# Altium PCB Smart-Switch-v2.0.PcbDoc (part 1 of 3)
Units mil, origin at the board's own origin, x right, y up, seen from the top; angles counter-clockwise.
Board outline 1456.69 x 1377.95 mil, 4 copper layers (Top Layer, Power Layer, Ground Layer, Bottom Layer), stack 39.334 mil thick; 71 components, 41 nets, 221 pads, 302 vias.
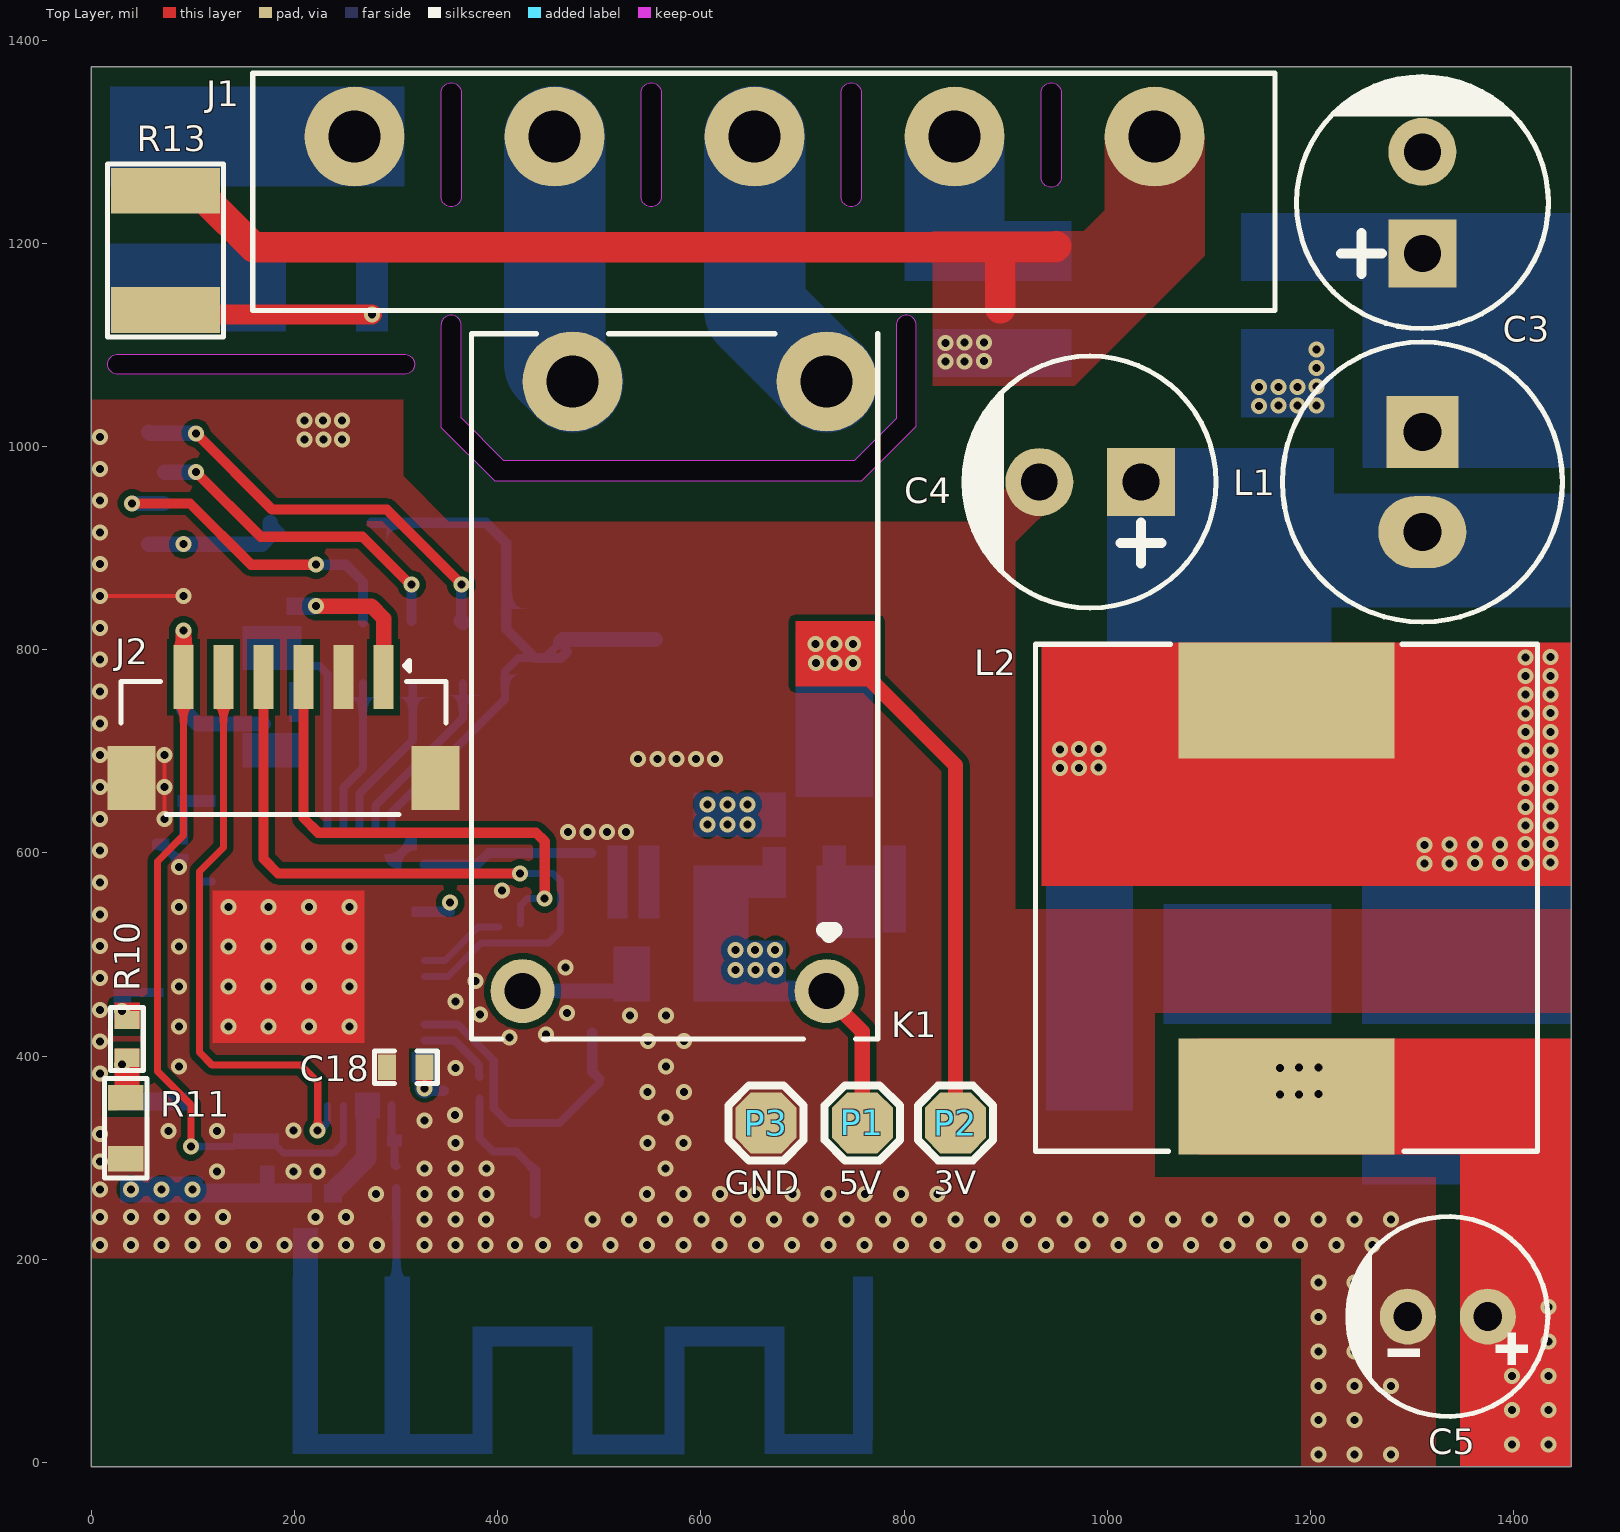
[diagram p0: Top Layer view]
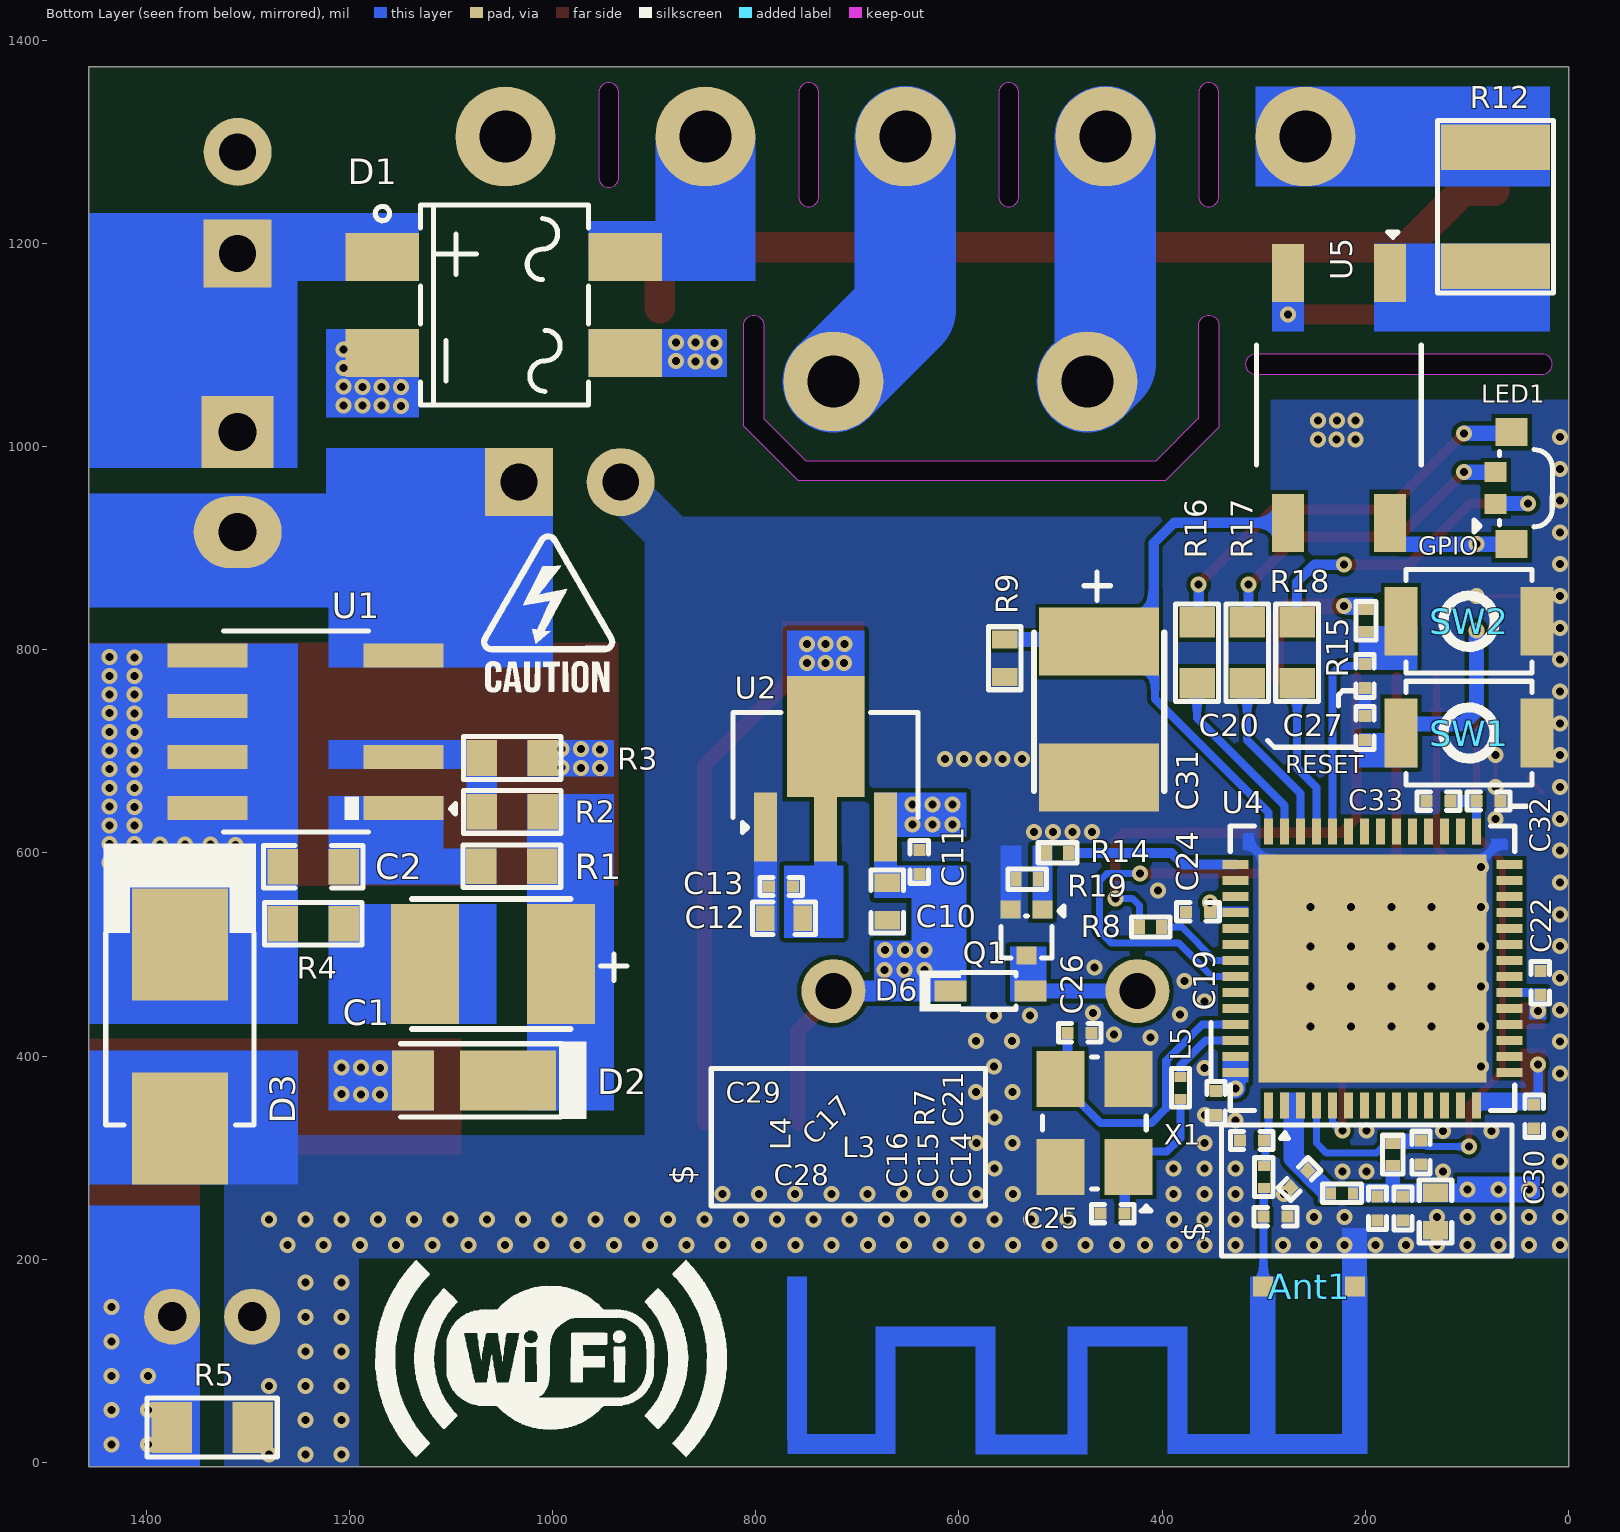
[diagram p1: Bottom Layer view, seen from below]
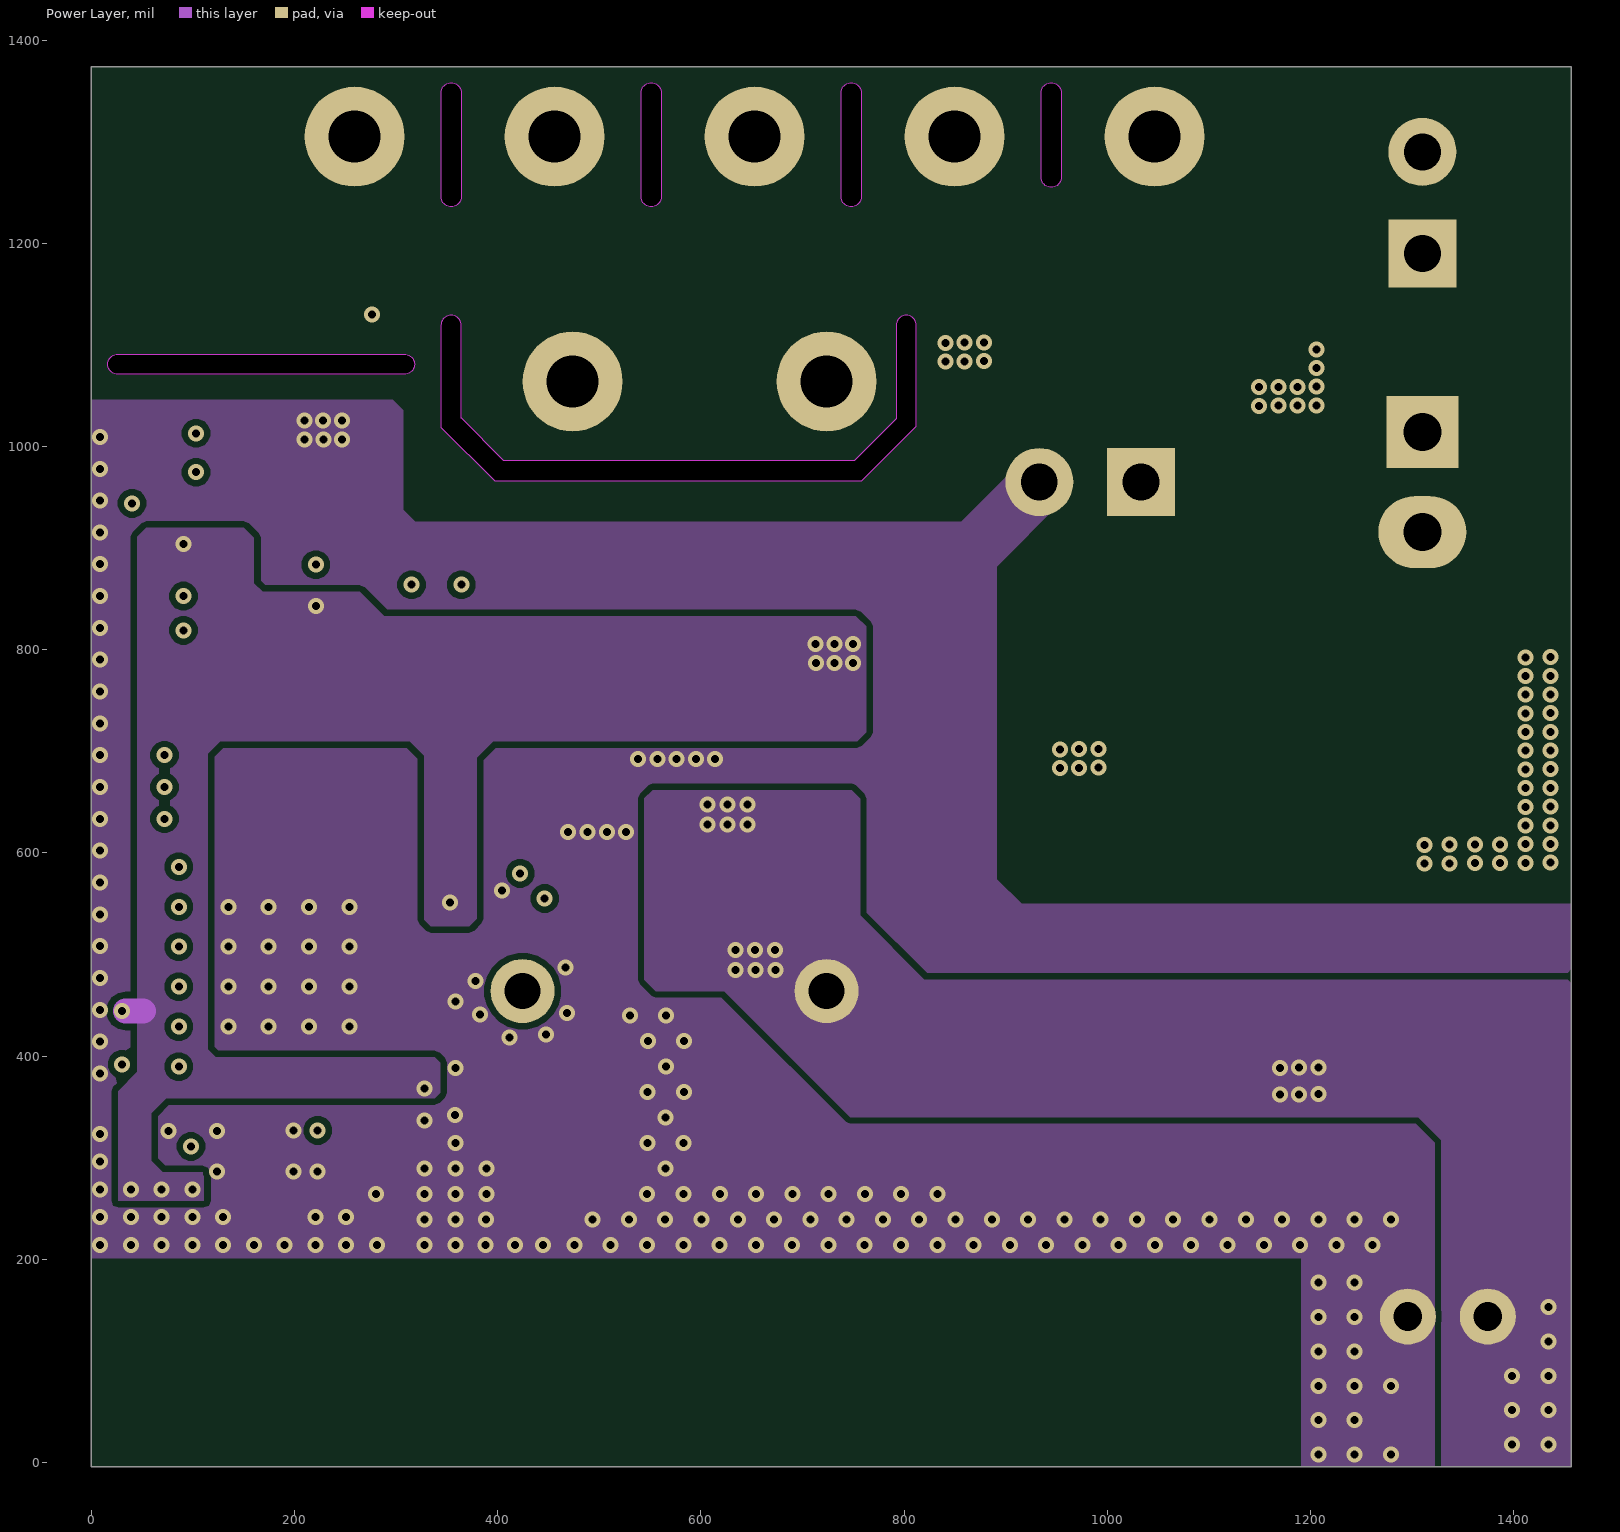
[diagram p2: Power Layer]
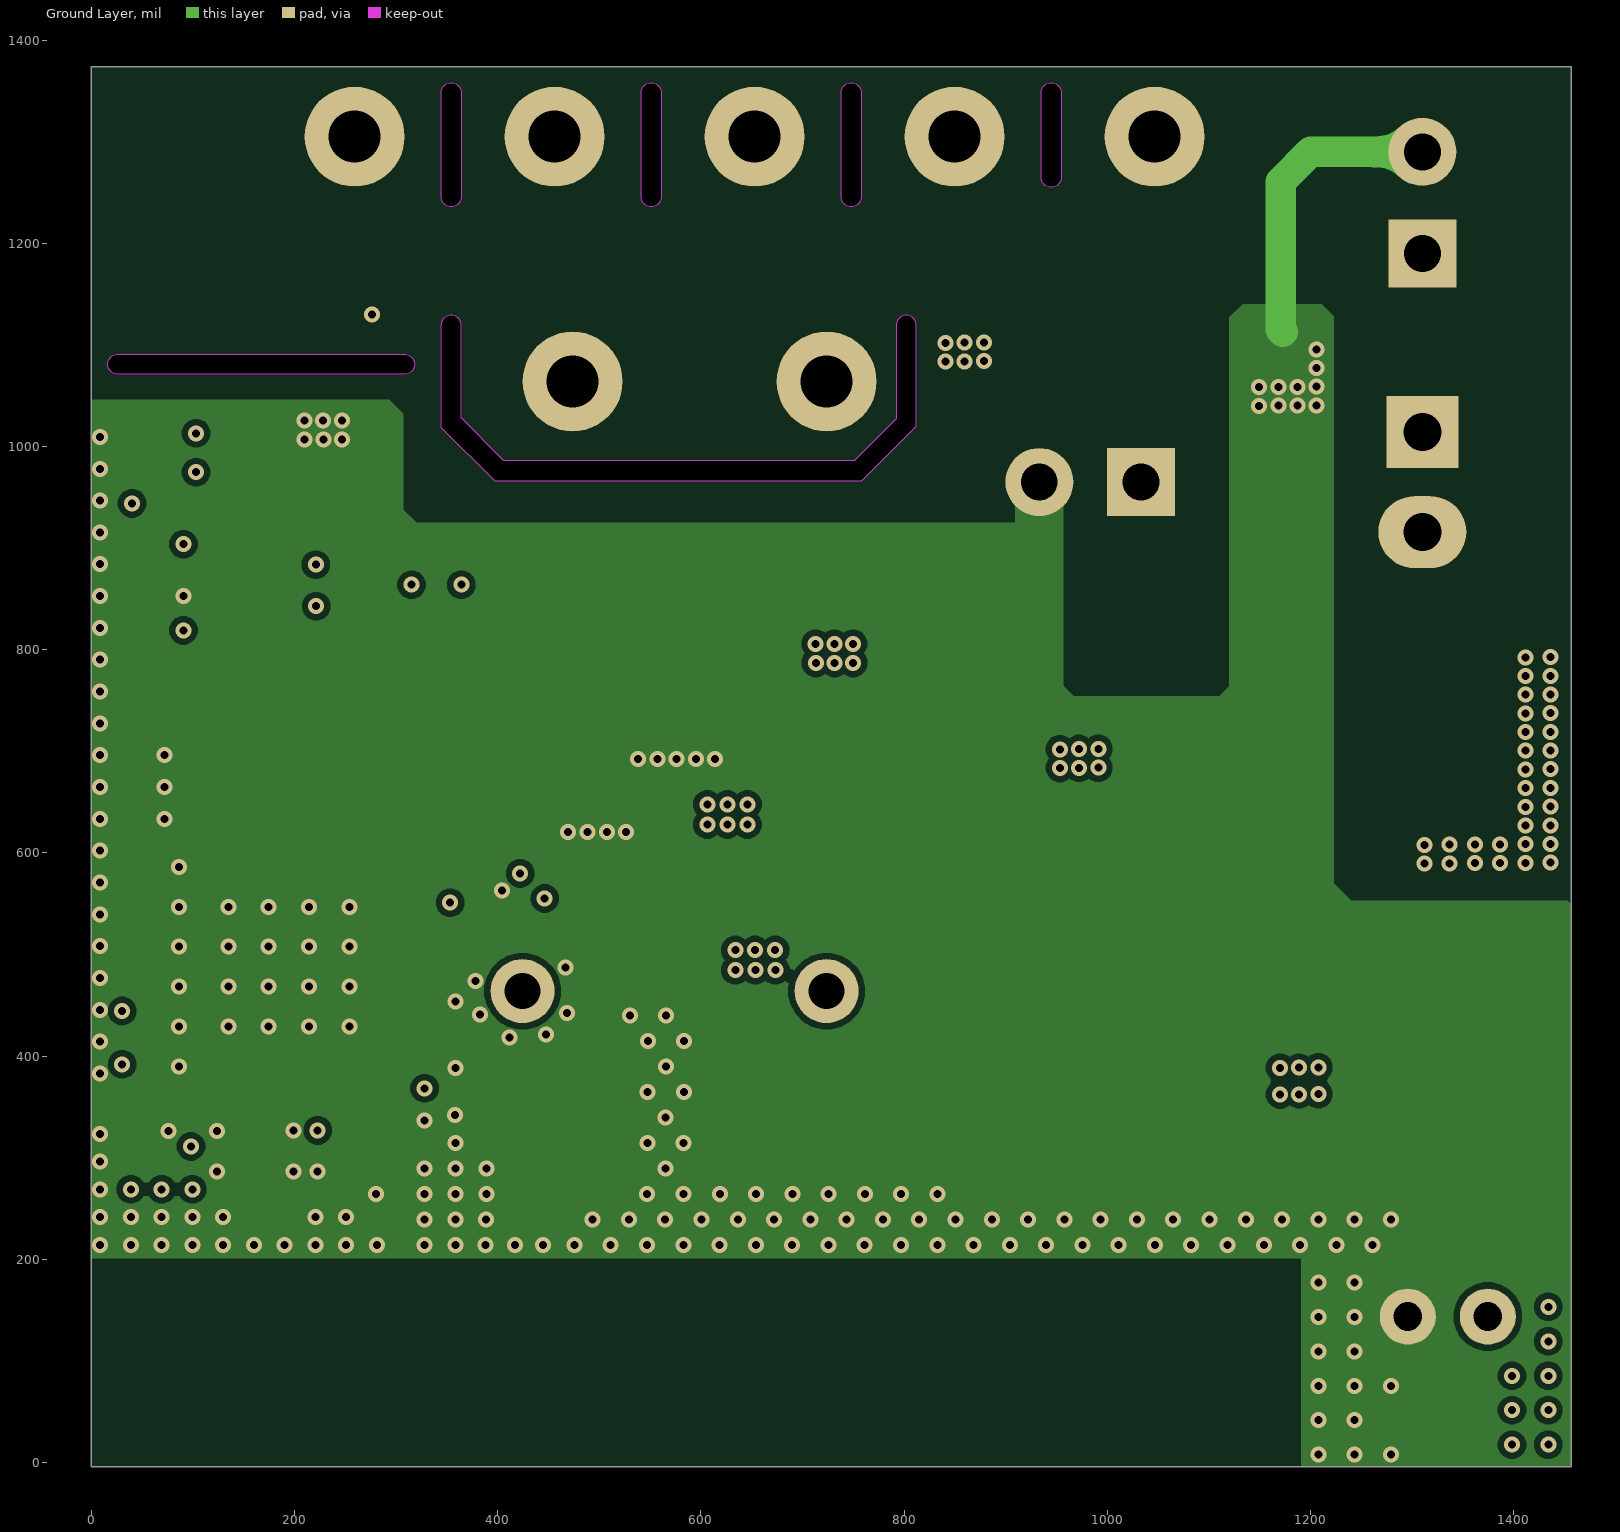
[diagram p3: Ground Layer]
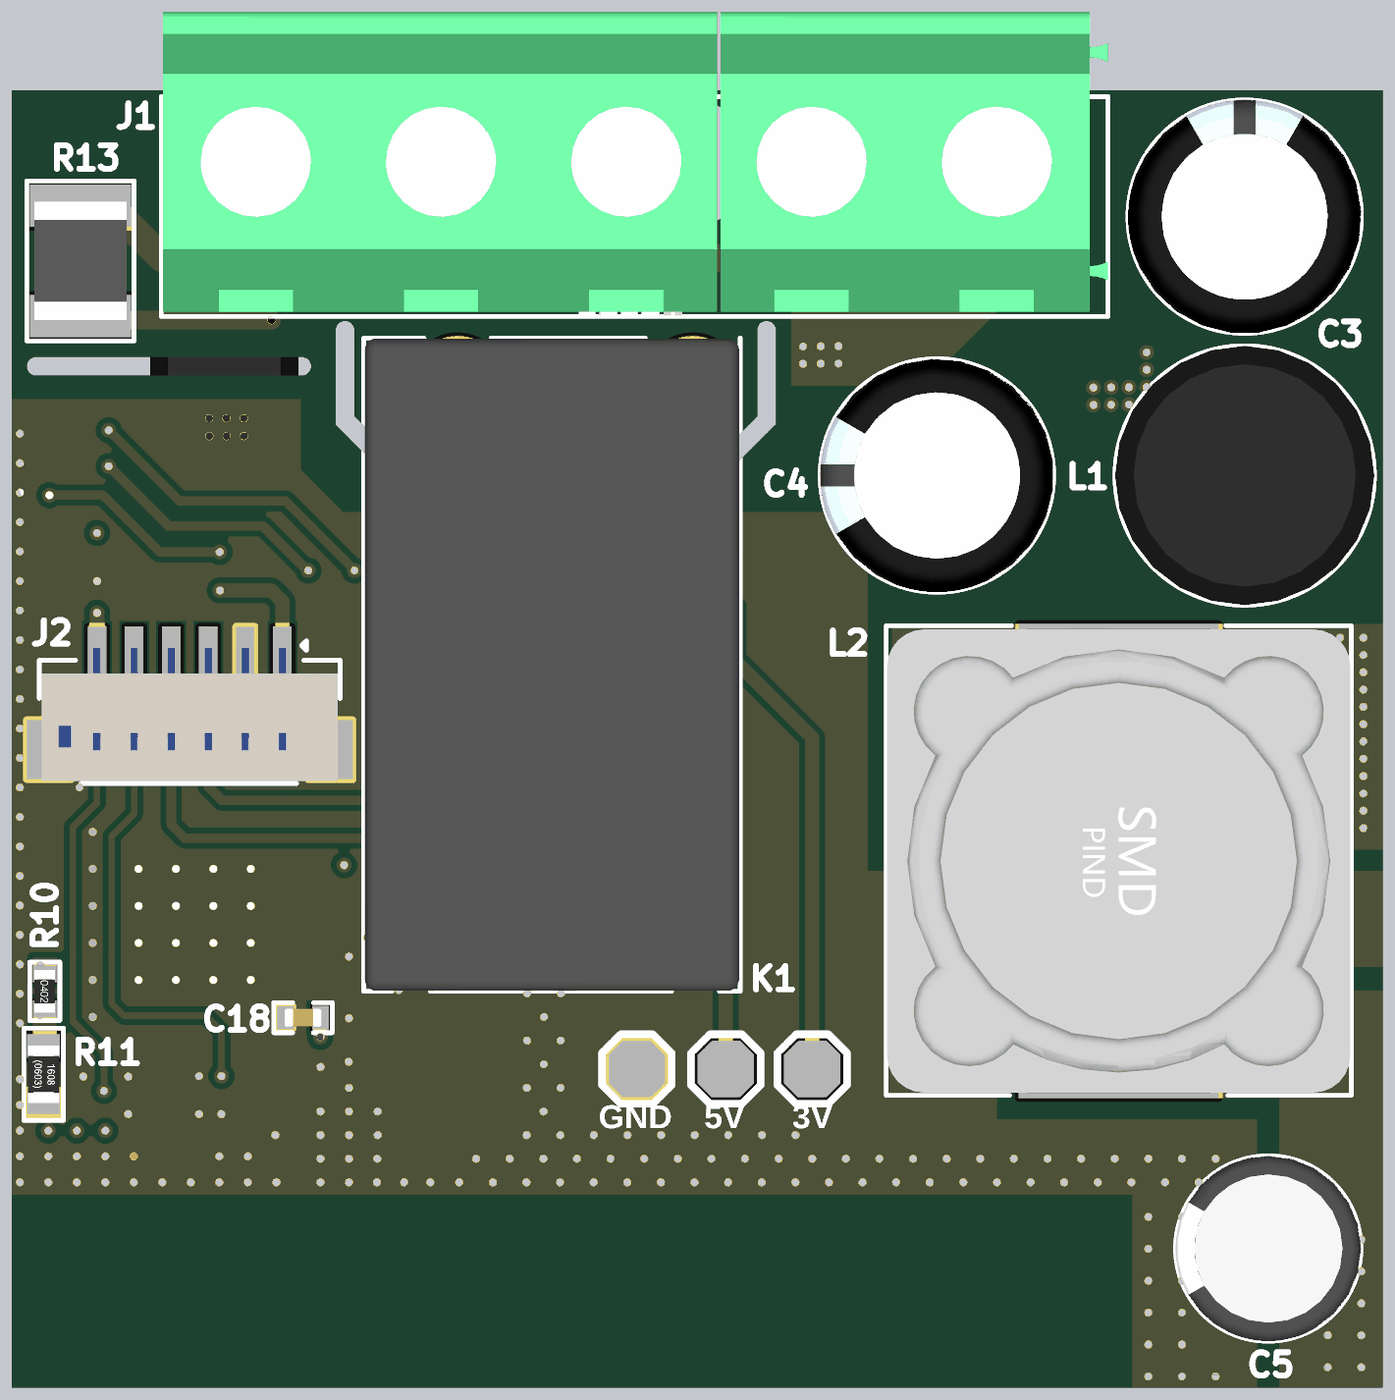
[diagram p5: 3D render of the assembled board from above, using the file's embedded part models]
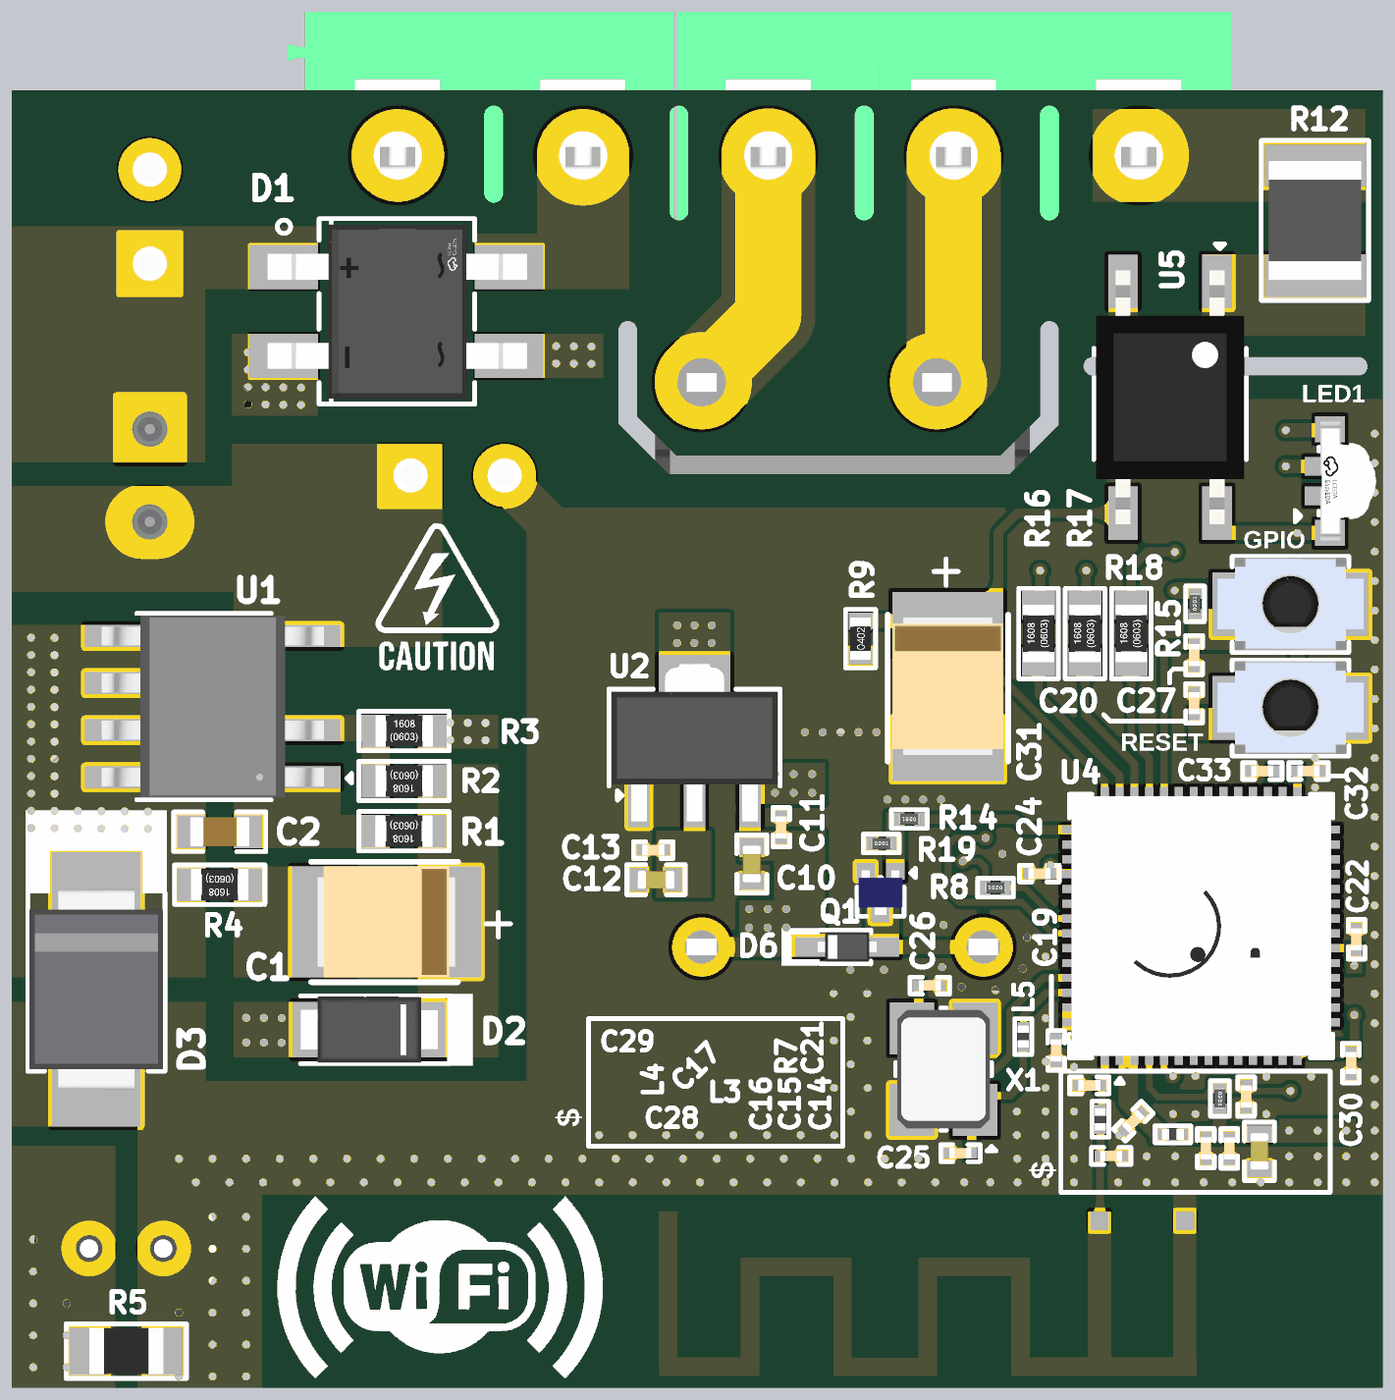
[diagram p6: 3D render of the assembled board from below, using the file's embedded part models]

## Layer stack, top to bottom
Top Solder: solder mask 0.4, Solder Resist, Dk 3.8
Top Layer: signal copper 1.378
Dielectric 2: prepreg 5.1, PP-006, Dk 4.6
Power Layer: signal copper 1.378
Dielectric 1: dielectric 23.622, FR-4, Dk 4.8
Ground Layer: signal copper 1.378
Dielectric 3: prepreg 5.1, PP-006, Dk 4.6
Bottom Layer: signal copper 1.378
Bottom Solder: solder mask 0.4, Solder Resist, Dk 3.8

## Board outline
0,-3.98 0,1373.98 1456.69,1373.98 1456.69,-3.98
cut-out: 344.09,1018.83 396.79,966.13 758.37,966.13 812.04,1019.8 812.04,1119.22 ccw(c802.04,1119.22) 802.04,1129.22 ccw(c802.04,1119.22) 792.04,1119.22 792.04,1027.33 750.84,986.13 406,986.13 364.5,1027.63 364.09,1027.63 364.09,1119.22 ccw(c354.09,1119.22) 354.09,1129.22 ccw(c354.09,1119.22) 344.09,1119.22
cut-out: 934.7,1264.98 934.7,1348 cw(c944.7,1348) 944.7,1358 cw(c944.7,1348) 954.7,1348 954.7,1264.98 cw(c944.7,1264.98) 944.7,1254.98 cw(c944.7,1264.98)
cut-out: 26,1071 cw(c26,1081) 16,1081 cw(c26,1081) 26,1091 308.02,1091 cw(c308.02,1081) 318.02,1081 cw(c308.02,1081) 308.02,1071
cut-out: 354.15,1235.98 cw(c354.15,1245.98) 344.15,1245.98 344.15,1348 cw(c354.15,1348) 354.15,1358 cw(c354.15,1348) 364.15,1348 364.15,1245.98 cw(c354.15,1245.98)
cut-out: 551,1235.98 cw(c551,1245.98) 541,1245.98 541,1348 cw(c551,1348) 551,1358 cw(c551,1348) 561,1348 561,1245.98 cw(c551,1245.98)
cut-out: 747.85,1235.98 cw(c747.85,1245.98) 737.85,1245.98 737.85,1348 cw(c747.85,1348) 747.85,1358 cw(c747.85,1348) 757.85,1348 757.85,1245.98 cw(c747.85,1245.98)

## Design rules (kind name [scope] priority, off if disabled: settings)
Clearance "Top Layer" [OnLayer('Top Layer')] p1: gap=4 ignorepadtopadclearanceinfootprint=FALSE except(6: Arc-Poly Track-Poly SMDPad-Poly THPad-Poly Via-Poly Fill-Poly Poly-Poly)
Clearance "Inner 1" [OnLayer('Power Layer')] p2: gap=4 ignorepadtopadclearanceinfootprint=FALSE except(6: Arc-Poly Track-Poly SMDPad-Poly THPad-Poly Via-Poly Fill-Poly Poly-Poly)
Clearance "Inner 2" [OnLayer('Ground Layer')] p3: gap=4 ignorepadtopadclearanceinfootprint=FALSE except(6: Arc-Poly Track-Poly SMDPad-Poly THPad-Poly Via-Poly Fill-Poly Poly-Poly)
Clearance "Bottom Layer" [OnLayer('Bottom Layer')] p4: gap=4 ignorepadtopadclearanceinfootprint=FALSE except(6: Poly-Poly)
ComponentClearance [All] p1: gap=0 collisioncheckmode=3 verticalgap=0 showdistances=FALSE
MinimumSolderMaskSliver [All] p1: minsoldermaskwidth=0
PolygonConnect [All] p1: connectstyle=Direct reliefconductorwidth=10 reliefentries=4 polygonreliefangle="45 Angle" airgapwidth=10
RoutingVias [All] p1: holewidth=7.87 width=15.75 viastyle="Through Hole" minholewidth=7.87 minwidth=15.75 maxholewidth=7.87 maxwidth=15.75
SilkToSilkClearance [All] p1: silktosilkclearance=0
SilkToSolderMaskClearance [IsPad] p1: minsilkscreentomaskgap=0 clearancetoexposedcopper=TRUE
SolderMaskExpansion [All] p1: expansion=4 istentingtop=FALSE
Width RF [InNetClass('RF')] p1: maxlimit=8.19 minlimit=5.18 preferedwidth=8.19 toplayer_minwidth=8.19 midlayer1_maxwidth=5.18 midlayer1_prefwidth=5.18 midlayer2_maxwidth=5.18 midlayer2_prefwidth=5.18 bottomlayer_minwidth=8.19 impedanceprofiledriven=TRUE impedanceprofileid={6EA76BCA-AD47-4699-BACC-62EAA46FC2F5} impedanceprofilevalue=50.000000 minimp=50.000000 maximp=50.000000 favimp=50.000000 // RF Impedance
Width [All] p2: maxlimit=100 minlimit=5 preferedwidth=10 minimp=50.000000 maximp=50.000000 favimp=50.000000
26 further rules are at their usual default settings.

## Classes and differential pairs
net class RF: NetAnt1_ANT# NetC29_2
component class U_Power-Sheet: 3 C1 C2 C3 C4 C5 C10 C11 C12 C13 D1 D2 D3 J1 L1 L2 P1 P2 P3 R1 R2 R3 R4 R5 SS U1 U2
component class U_Controller-Sheet: 2 Ant1 C14 C15 C16 C17 C18 C19 C20 C21 C22 C24 C25 C26 C27 C28 C29 C30 C31 C32 C33 D6 J2 K1 L3 L4 L5 LED1 Q1 R7 R8 R9 R10 R11 R12 R13 R14 R15 R16 R17 R18 R19 SW1 SW2 U4 U5 X1

## Components (designator, comment, footprint, x,y, rotation, side; value= is the part's Value field where it differs from the comment)
Ant1 "ESP Patch Anttena" "ESP Patch Antenna" 198,221 r0 bottom locked net-tie
C1 "10uF" Case-B 1058.7,490.7 r0 bottom
C2 "0.1uF" Cap-0603 1235.69,586.46 r180 bottom
C3 "2.2uF" ECG2GM2R2E09OTBO 1310,1240 r90 top
C4 "2.2uF" ECG2GM2R2E09OTBO 983,965 r180 top
C5 "220uF" 10ZLQ220MEFC5X11 1335.03,143.68 r180 top
C10 "10uF" Cap-0402 670.43,552.19 r90 bottom
C11 "0.1uf" CAP-0201 639.06,591.19 r270 bottom value=100nF
C12 "10uF" Cap-0402 772.15,535.55 r180 bottom
C13 "0.1uf" CAP-0201 775.06,567 r180 bottom value=100nF
C14 "10uF" Cap-0402 131,247 r90 bottom
C15 "1uF" CAP-0201 163.05,250.02 r90 bottom
C16 "0.1uf" CAP-0201 188.05,250.21 r90 bottom value=100nF
C17 "0.1uf" CAP-0201 265,279 r135 bottom value=100nF
C18 "1uF" Cap-0402 309.45,389 r0 top
C19 "0.1uF" CAP-0201 347.04,354.09 r90 bottom value=100nF
C20 "0.1uf" CAP-0201 200.45,723 r270 bottom value=100nF
C21 "1uF" CAP-0201 145.21,305.09 r90 bottom
C22 "0.1uf" CAP-0201 27.84,472.21 r270 bottom value=100nF
C24 "0.1uf" CAP-0201 364.82,542.03 r180 bottom value=100nF
C25 "22PF" CAP-0201 448.72,245 r180 bottom value=22pF
C26 "22PF" CAP-0201 481.23,423 r0 bottom value=22pF
C27 "0.1uf" CAP-0201 200.45,774.14 r90 bottom value=100nF
C28 "2.7pF" CAP-0201 288.5,242 r0 bottom
C29 "4.7pF" CAP-0201 311.81,317 r180 bottom
C30 "0.1uF" CAP-0201 33.84,340.72 r90 bottom value=100nF
C31 "33uF" Case-B 462,740.94 r270 bottom
C32 "0.1uF" CAP-0201 78.8,651.04 r0 bottom value=100nF
C33 "1uF" CAP-0201 128,651 r180 bottom
D1 "MB10S" MBS10S 1048,1139.32 r180 bottom
D2 "DFLF1800-7" PowerDI123 1090.88,376.17 r180 bottom
D3 "STTH3R06U" SMB_ 1366.82,419.13 r90 bottom
D6 "1N4148WT" SOD-523F 569,464.15 r0 bottom
J1 "WJ127-5.0-5P" WJ127-5.0-5P 652.78,1305.03 r180 top
J2 "Voltlink Target" "Voltlink Target" 189.06,723.31 r180 top
K1 "HF32FA-G/005-HSL1" HF32FA-G/005-HSL1 574,764 r90 top locked
L1 "1mH" SPK0608-102MB 1310,965 r270 top
L2 "470uH" SMDRI127-471MT 1176.18,555.37 r270 top locked
L3 "2nH" IND-0201 223,265 r0 bottom
L4 "1.6nH" IND-0201 300,281 r90 bottom
L5 "24nH" IND-0201 382,368.83 r270 bottom
LED1 "MHS110FRGBCT" MHS110FRGBCT 64,959 r270 bottom
P1 "TEST POINT" Test-point 758.74,334.32 r270 top
P2 "TEST POINT" Test-point 850.51,334.32 r270 top
P3 "TEST POINT" Test-point 664.08,334.32 r270 top
Q1 "MMBT3904M" SOT-723 533.63,521.77 r0 bottom
R1 "3K" Res-0603#1 1040,587 r180 bottom
R2 "3.83K" Res-0603#1 1039.83,640.4 r180 bottom value=3.83kR
R3 "2.49K" Res-0603#1 1039.84,693.42 r0 bottom value=2.49kR
R4 "15R" Res-0603#1 1235.71,530.29 r180 bottom
R5 "10K" RES-0805 1335,34.6 r0 bottom
R7 "10K" Res-0201 173,303.09 r270 bottom
R8 "499R" Res-0201 411.41,527.11 r0 bottom
R9 "1K" Res-0402 554.89,791.64 r90 bottom
R10 "10K" Res-0402 35,417 r270 top
R11 "10k" Res-0603#2 33.84,328.91 r90 top value=10kR
R12 "33K" Res_1210 72,1236 r270 bottom
R13 "33K" Res_1210 73,1193 r270 top
R14 "4.7K" Res-0201 503,600 r0 bottom
R15 "10K" Res-0201 199.45,828.63 r90 bottom
R16 "240R" Res-0603#1 365.7,797.02 r270 bottom
R17 "100R" RES-0603 316.35,797.02 r270 bottom
R18 "100R" RES-0603 267.25,797.02 r270 bottom
R19 "47K" Res-0201 532.78,574 r180 bottom value=47kR
SW1 "B3U-1000P" B3U-1000P 98,718 r0 bottom
SW2 "B3U-1000P" B3U-1000P 98,828 r0 bottom
U1 "LNK3207D-TL" SO-8C 1243.22,719.42 r0 bottom
U2 "LD1117AG-33-AB3-A-R" SOT-89-3 731.25,670.02 r180 bottom
U4 "ESP32-S3FH4R2" "QFNWB-56 (7×7)" 193,486.36 r90 bottom
U5 "PS2705-1-F3-A" SOP-4_2.54 226,1048 r270 bottom
X1 "40MHz" X322540MPB4SI_ 466.72,334.25 r90 bottom value=40MHZ

## Footprints (in the part's own frame and the unit in brackets; to place one, negate y for a bottom-side part, rotate by r counter-clockwise, add the part's x,y. Pads: shape width x height; smd on the part's side, far side on the other; paste and mask are expansions set on the pad)
10ZLQ220MEFC5X11 [mm]
  round 1.4 hole 0.72 paste+0 mask+0.05: 1(-1,0) 2(1,0)
  silkscreen extent -2.5,-2.5 2.54,2.5, body extent -2.5,-2.5 2.5,2.5, height 11.01
B3U-1000P [mm] "SWITCH TACTILE SPST-NO 0.05A 12V"
  rect 0.82x1.72 smd: 1(-1.7,0) 2(1.7,0)
  silkscreen extent -1.57,-1.3 1.57,1.3, body extent -2,-1.26 2,1.24, height 1.6
CAP-0201 [mm]
  rect 0.3x0.3 smd mask+0.055: 1(-0.3,0) 2(0.3,0)
  silkscreen extent -0.53,-0.23 0.53,0.23, body extent -0.3,-0.15 0.3,0.15, height 0.28
Cap-0402 [mil]
  rect 18x25 smd mask+2.36: 1(-18.5,0) 2(18.5,0)
  silkscreen extent -31,-16 31,16, body extent -20,-10 20,10, height 19
Cap-0603 [mil]
  rect 30x35 smd mask+2.36: 1(-30,0) 2(30,0)
  silkscreen extent -49,-21 49,21, body extent -32,-16 31,16, height 34
Case-B [mm]
  rect 1.7x3 smd paste+0: 1(-1.7,0) 2(1.7,0)
  silkscreen extent -3.35,-1.63 2.03,1.63, body extent -1.85,-1.5 1.85,1.5, height 2.16
ECG2GM2R2E09OTBO [mm]
  rect 1.7x1.7 hole 0.92 paste+0 mask+0.051: 1(-1.27,0)
  round 1.7 hole 0.92 paste+0 mask+0.051: 2(1.27,0)
  silkscreen extent -3.15,-3.15 3.17,3.15, body extent -3.16,-3.15 3.16,3.15, height 11.11
"ESP Patch Antenna" [mm]
  rect 0.5x0.5 smd: ANT#(2.616,1.213) GND(0.305,1.213)
  Top Layer region: 14.498,5.405 14.498,4.905 11.798,4.905 11.798,5.405
  Top Layer region: 12.3,2.21 11.8,2.21 11.8,5.055 12.3,5.055
  Top Layer region: 9.648,2.209 9.648,2.709 11.959,2.709 11.959,2.209
  Top Layer region: 9.3,5.029 9.8,5.029 9.8,2.21 9.3,2.21
  Top Layer region: 9.796,5.409 9.796,4.909 6.996,4.909 6.996,5.409
  Top Layer region: 7.5,2.21 7,2.21 7,5.029 7.5,5.029
  Top Layer region: 4.873,2.209 4.873,2.709 7.133,2.709 7.133,2.209
  Top Layer region: 4.5,5.029 5,5.029 5,2.21 4.5,2.21
  Top Layer region: 2.3,5.029 2.93,5.029 2.93,0.963 2.3,0.963
  Top Layer region: -0.002,4.905 -0.002,5.405 4.998,5.405 4.998,4.905
  Top Layer region: 0,5.029 0.63,5.029 0.63,0.963 0,0.963
  Top Layer region: 14.005,5.055 14.505,5.055 14.505,0.963 14.005,0.963
HF32FA-G/005-HSL1 [mm]
  round 1.6 hole 0.9: 1(-7.62,-3.8) 2(-7.62,3.8)
  round 2.5 hole 1.3: 3(7.62,2.55) 4(7.62,-3.8)
  silkscreen extent -8.81,-5.08 8.81,5.08, body extent -8.8,-5.05 8.8,5.06, height 12.6
IND-0201 [mm]
  rect 0.25x0.3 smd mask+0.055: 1(-0.275,0) 2(0.275,0)
  silkscreen extent -0.48,-0.23 0.48,0.23, body extent -0.3,-0.15 0.3,0.15, height 0.15
MBS10S [mm]
  rect 1.84x1.2 smd paste+0 mask+0.051: 1(-3.037,1.2) 2(-3.036,-1.2) 3(3.037,-1.2) 4(3.036,1.2)
  silkscreen extent -3.21,-2.5 2.11,2.5, body extent -3.47,-2.35 3.53,2.35, height 2.62
MHS110FRGBCT [mm]
  rect 0.7x0.8 smd: 1(1.4,0.2) 4(-1.4,0.2)
  rect 0.5x0.55 smd: 2(0.4,-0.2) 3(-0.4,-0.2)
  silkscreen extent -0.91,-0.1 0.91,-0.1, body extent -1.6,-0.05 1.6,1.45, height 1.01
PowerDI123 [mm]
  rect 1.05x1.5 smd: 1(-1.187,0)
  rect 2.4x1.5 smd: 2(1.188,0)
  silkscreen extent -1.5,-0.97 3.15,0.96, body extent -1.49,-0.89 2.21,0.89, height 1
"QFNWB-56 (7×7)" [mm]
  rect 0.65x0.22 smd: 1(-3.425,2.6) 2(-3.425,2.2) 3(-3.425,1.8) 4(-3.425,1.4) 5(-3.425,1) 6(-3.425,0.6) 7(-3.425,0.2) 8(-3.425,-0.2) 9(-3.425,-0.6) 10(-3.425,-1) 11(-3.425,-1.4) 12(-3.425,-1.8) 13(-3.425,-2.2) 14(-3.425,-2.6) 29(3.425,-2.6) 30(3.425,-2.2) 31(3.425,-1.8) 32(3.425,-1.4) 33(3.425,-1) 34(3.425,-0.6) 35(3.425,-0.2) 36(3.425,0.2) 37(3.425,0.6) 38(3.425,1) 39(3.425,1.4) 40(3.425,1.8) 41(3.425,2.2) 42(3.425,2.6)
  rect 0.22x0.65 smd: 15(-2.6,-3.425) 16(-2.2,-3.425) 17(-1.8,-3.425) 18(-1.4,-3.425) 19(-1,-3.425) 20(-0.6,-3.425) 21(-0.2,-3.425) 22(0.2,-3.425) 23(0.6,-3.425) 24(1,-3.425) 25(1.4,-3.425) 26(1.8,-3.425) 27(2.2,-3.425) 28(2.6,-3.425) 43(2.6,3.425) 44(2.2,3.425) 45(1.8,3.425) 46(1.4,3.425) 47(1,3.425) 48(0.6,3.425) 49(0.2,3.425) 50(-0.2,3.425) 51(-0.6,3.425) 52(-1,3.425) 53(-1.4,3.425) 54(-1.8,3.425) 55(-2.2,3.425) 56(-2.6,3.425)
  rect 5.7x5.7 smd: 57(0,0)
  silkscreen extent -3.56,-3.56 3.56,3.56, body extent -3.5,-3.51 3.5,3.49, height 0.92
Res-0201 [mm]
  rect 0.27x0.37 smd mask+0.055: 1(-0.275,0) 2(0.275,0)
  silkscreen extent -0.48,-0.25 0.48,0.25, body extent -0.3,-0.15 0.3,0.15, height 0.29
Res-0402 [mil]
  rect 18x25 smd mask+2.17: 1(-18.5,0) 2(18.5,0)
  silkscreen extent -32,-17 32,16, body extent -23,-11 23,11, height 16
Res-0603#1 [mil]
  rect 30x35 smd: 1(-30,0) 2(30,0)
  silkscreen extent -48,-21 48,21, body extent -31,-17 31,17, height 18
Res-0603#2 [mil]
  rect 25x35 smd: 1(-30,0) 2(30,0)
  silkscreen extent -49,-21 49,21, body extent -31,-17 31,17, height 18
RES-0603 [mil]
  rect 30x35 smd: 1(-30,0) 2(30,0)
  silkscreen extent -48,-21 48,21, body extent -31,-17 31,17, height 18
RES-0805 [mil] "SMD 0805"
  rect 40x50 smd: 1(-40,0) 2(40,0)
  silkscreen extent -64,-29 64,29, body extent -39,-25 39,24, height 24
Res_1210 [mm]
  rect 1.14x2.72 smd: 1(-1.49,0) 2(1.49,0)
  silkscreen extent -2.16,-1.45 2.16,1.45, body extent -1.6,-1.25 1.6,1.25, height 0.7
SMB_ [mm]
  rect 2.8x2.4 smd: 1(-2.3,0) 2(2.3,0)
  silkscreen extent -2.21,-1.9 4.83,1.91, body extent -2.7,-1.8 2.7,1.8, height 2.3
SMDRI127-471MT [mm]
  rect 2.9x5.4 smd: 1(-4.95,0) 2(4.95,0)
  silkscreen extent -6.35,-6.27 6.32,6.27, body extent -6.28,-6.25 6.28,6.25, height 8
SO-8C [mm]
  rect 2x0.6 smd: 1(-2.45,1.905) 2(-2.45,0.635) 4(-2.45,-1.905) 5(2.45,-1.905) 6(2.45,-0.635) 7(2.45,0.635) 8(2.45,1.905)
  silkscreen extent -3.75,-2.51 2.05,2.51, body extent -3,-2.45 3,2.45, height 1.76
SOD-523F [mm]
  rect 0.8x0.52 smd: 1(-1,0) 2(1,0)
  silkscreen extent -0.64,-0.51 1.78,0.51, body extent -0.8,-0.4 0.8,0.4, height 0.7
SOP-4_2.54 [mm]
  rect 1.45x0.8 smd: 1(-3.125,1.27) 2(-3.125,-1.27) 3(3.125,-1.27) 4(3.125,1.27)
  silkscreen extent -4.14,-2.06 1.68,2.06, body extent -3.43,-2 3.43,2, height 2.02
SOT-89-3 [mm]
  rect 0.58x1.73 smd: 1(-1.5,-1.132) 2(0,-1.132) 3(1.5,-1.132)
  rect 1.933x3.03 smd: 2(0,1.132)
  silkscreen extent -2.31,-1.27 2.31,1.73, body extent -2.25,-1.84 2.25,2.41, height 1.54
SOT-723 [mm]
  rect 0.5x0.45 smd: 1(-0.4,-0.575) 2(0.4,-0.575) 3(0,0.575)
  silkscreen extent -0.94,-0.66 0.64,0.64, body extent -0.6,-0.6 0.6,0.6, height 0.5
SPK0608-102MB [mm]
  rect 1.8x1.8 hole 0.95: 1(-1.25,0)
  oval 1.8x2.2 hole 0.95: 2(1.25,0)
  silkscreen extent -3.5,-3.5 3.5,3.5, body extent -3.5,-3.49 3.5,3.49, height 11
Test-point [mil]
  oct 60x60 smd: 1(0,0)
  silkscreen extent -37,-37 37,37
"Voltlink Target" [mm]
  rect 0.5x1.6 smd: 1(-2.5,-1.262) 2(-1.5,-1.262) 3(-0.5,-1.262) 4(0.5,-1.262) 5(1.5,-1.262) 6(2.5,-1.262)
  rect 1.2x1.6 smd: MP1(-3.8,1.262) MP2(3.8,1.262)
  silkscreen extent -4.06,-1.68 4.06,2.17, body extent -4,-1.49 4,2.11, height 4.25
WJ127-5.0-5P [mm]
  round 2.5 hole 1.3: 1(-10,0) 2(-5,0) 3(0,0) 4(5,0) 5(10,0)
  silkscreen extent -13,-1.58 12.55,4.34, body extent -13,-3.88 12.5,4.32, height 10.1
X322540MPB4SI_ [mm]
  rect 1.4x1.2 smd: 1(-1.1,-0.85) 2(1.1,-0.85) 3(1.1,0.85) 4(-1.1,0.85)
  silkscreen extent -1.65,-1.3 1.65,1.3, body extent -1.6,-1.25 1.6,1.25, height 0.8

## Part data
Ant1: "ESP32 MIFA PCB ANTENNA", Item Type=Antenna, Manufacturer Part Number="ESP Patch Anttena"
C1: library part CA45-B025K106T, "10uF 25V 2.5Ω@100kHz ±10% CASE-B-3528 Tantalum Capacitors ROHS", LCSC Part Number=C119050, Manufacturer="Xiangyee in S&T", Package=Case-B, ComponentLink1Description=LCSC, ComponentLink1URL=https://www.lcsc.com/product-detail/Tantalum-Capacitors_Hunan-Xiangyee-in-S-T-CA45-B025K106T_C119050.html, Item Type=Capacitor, Manufacturer Part Number=CA45-B025K106T
C2: library part CL10B104KB8NNNC, "CAP CER 0.1UF 50V X7R 0603", Capacitance=100nF, Case Code (Imperial)=0603, Case Code (Metric)=1608, Dielectric=X7R, LCSC Part Number=C1591, Manufacturer=Samsung, Max Operating Temperature=125°C, Min Operating Temperature=-55°C, Package Quantity=1, Supplier Part Number 1=1276-1000-1-ND, Tolerance=10%, Voltage=50V, Case/Package=0603, Category="Ceramic Capacitors", ComponentLink1Description=https://datasheet.ciiva.com/25803/cl10b104kb8nnnc-25803393.pdf?src-supplier=Digi-Key, ComponentLink1URL=https://datasheet.ciiva.com/25803/cl10b104kb8nnnc-25803393.pdf?src-supplier=Digi-Key, ComponentLink2Description=https://datasheet.ciiva.com/26838/getdatasheetpartid-89097-26838411.pdf?src-supplier=Verical, ComponentLink2URL=https://datasheet.ciiva.com/26838/getdatasheetpartid-89097-26838411.pdf?src-supplier=Verical, ComponentLink3Description=https://datasheet.ciiva.com/29198/456651-da-01-en-vs-kondensator-0605-29198839.pdf?src-supplier=Conrad, ComponentLink3URL=https://datasheet.ciiva.com/29198/456651-da-01-en-vs-kondensator-0605-29198839.pdf?src-supplier=Conrad, Construction=Flat, Contact Plating=Tin, Depth=0.8mm, Height=0.8mm, Lead Free="Lead Free", Length=1.6mm, Manufacturer Part Number=CL10B104KB8NNNC, Material=Ceramic, Mount="Surface Mount", Packaging="Tape and Reel", Pricing 1="1=0.10000, 10=0.03000, 50=0.01640, 100=0.01340, 500=0.00954, 1000=0.00750 (USD)", Radiation Hardening=No, RoHS=Yes, RoHS Compliant=Yes, Series=CL, Stock 1=3998791, Supplier 1=Digi-Key, Thickness=0.035inch, Voltage Rating=50V, Voltage Rating (DC)=50V, Width=0.031inch
C3 C4: library part ECG2GM2R2E09OTBO, "2.2uF 400V ±20% 70mA@100kHz Plugin,D6.3xL9mm Aluminum Electrolytic Capacitors - Leaded ROHS", LCSC Part Number=C525475, Manufacturer=Yunxing, Package=Plugin,D6.3xL9mm, ComponentLink1Description=LCSC, ComponentLink1URL=https://www.lcsc.com/product-detail/Aluminum-Electrolytic-Capacitors-Leaded_Yunxing-ECG2GM2R2E09OTBO_C525475.html, Item Type=Capacitor, Manufacturer Part Number=ECG2GM2R2E09OTBO
C5: library part 10ZLQ220MEFC5X11, "220uF 10V ±20% Plugin,D5xL11mm Aluminum Electrolytic Capacitors - Leaded ROHS", LCSC Part Number=C694058, Manufacturer=Rubycon, Package=Plugin,D5xL11mm, ComponentLink1Description=LCSC, ComponentLink1URL=https://www.lcsc.com/product-detail/Aluminum-Electrolytic-Capacitors-Leaded_Rubycon-10ZLQ220MEFC5X11_C694058.html, Item Type=Capacitor, Manufacturer Part Number=10ZLQ220MEFC5X11
C10 C12 C14: library part CL05A106MP5NUNC, "CAP CER 10UF 10V X5R 0402", Case Code (Imperial)=0402, Case Code (Metric)=1005, Dielectric=X5R, LCSC Part Number=C315248, Manufacturer=Samsung, Max Operating Temperature=85°C, Min Operating Temperature=-55°C, Package Quantity=1, Tolerance=20%, Voltage Rating=10V, Capacitance=10uF, Case/Package=0402, Category="Ceramic Capacitors", ComponentLink1Description=https://datasheet.ciiva.com/25721/cl05a106mp5nunc-25721584.pdf?src-supplier=Digi-Key, ComponentLink1URL=https://datasheet.ciiva.com/25721/cl05a106mp5nunc-25721584.pdf?src-supplier=Digi-Key, ComponentLink2Description=https://datasheet.ciiva.com/26838/getdatasheetpartid-745310-26838170.pdf?src-supplier=Verical, ComponentLink2URL=https://datasheet.ciiva.com/26838/getdatasheetpartid-745310-26838170.pdf?src-supplier=Verical, Construction=Flat, Contact Plating=Tin, Depth=0.5mm, Item Type=Capacitor, Lead Free="Lead Free", Length=1mm, Manufacturer Part Number=CL05A106MP5NUNC, Mount="Surface Mount", Packaging="Tape and Reel", Pricing 1="10000=0.02537 (USD)", Radiation Hardening=No, RoHS=Yes, RoHS Compliant=Yes, Series=CL, Stock 1=1729850, Supplier 1=Avnet, Supplier Part Number 1=CL05A106MP5NUNC, Termination=Wraparound, Thickness=0.028inch, Width=0.02inch
C11 C13 C16 C17 C19 C20 C22 C24 C27 C30 C32: library part GRM033R61E104KE14D, "CAP CER 0.1UF 25V X5R 0201", Case Code (Imperial)=0201, Case Code (Metric)=0603, Dielectric=X5R, LCSC Part Number=C76939, Manufacturer=Murata, Max Operating Temperature=85°C, Min Operating Temperature=-55°C, Package Quantity=15000, Supplier Part Number=1852066, Tolerance=10%, Voltage Rating=25V, Case/Package=0201, Category="Ceramic Capacitors", ComponentLink1Description=http://www.farnell.com/datasheets/2867843.pdf?src-supplier=Farnell, ComponentLink1URL=http://www.farnell.com/datasheets/2867843.pdf?src-supplier=Farnell, ComponentLink2Description=http://www.mouser.com/ds/2/281/c02e-2905.pdf?src-supplier=Mouser, ComponentLink2URL=http://www.mouser.com/ds/2/281/c02e-2905.pdf?src-supplier=Mouser, ComponentLink3Description=https://datasheet.octopart.com/GRM033R61E104KE14D-Murata-datasheet-22122223.pdf?src-supplier=Future+Electronics, ComponentLink3URL=https://datasheet.octopart.com/GRM033R61E104KE14D-Murata-datasheet-22122223.pdf?src-supplier=Future+Electronics, ComponentLink4Description=http://www.farnell.com/datasheets/2867843.pdf?src-supplier=Element14, ComponentLink4URL=http://www.farnell.com/datasheets/2867843.pdf?src-supplier=Element14, ComponentLink5Description=http://search.murata.co.jp/Ceramy/image/img/A01X/G101/ENG/GRM033R61E104KE14-01.pdf?src-supplier=Digi-Key, ComponentLink5URL=http://search.murata.co.jp/Ceramy/image/img/A01X/G101/ENG/GRM033R61E104KE14-01.pdf?src-supplier=Digi-Key, ComponentLink6Description=http://www.farnell.com/datasheets/2867843.pdf?src-supplier=Newark, ComponentLink6URL=http://www.farnell.com/datasheets/2867843.pdf?src-supplier=Newark, ComponentLink7Description=https://datasheet.octopart.com/GRM033R61E104KE14D-Murata-datasheet-165579666.pdf?src-supplier=TME, ComponentLink7URL=https://datasheet.octopart.com/GRM033R61E104KE14D-Murata-datasheet-165579666.pdf?src-supplier=TME, Height=0.3mm, Item Type=Capacitor, Lead Free="Lead Free", Length=0.024inch, Manufacturer Part Number=GRM033R61E104KE14D, Material=4241ConductorMaterial, Mounting Technology="Surface Mount", Packaging="Tape and Reel", Pricing="1000=0.008, 5000=0.007, 10000=0.006 (GBP)", RoHS=Yes, RoHS Compliant=Yes, Series=GRM, Stock=14000, Supplier=Rs, Termination=SMD/SMT, Thickness=0.013inch, Voltage Rating (DC)=25V, Weight=1.2E-05oz, Width=0.012inch
C15 C21 C33: library part GRM033R61C105ME15D, "CAP CER 1UF 16V X5R 0201", LCSC Part Number=C335102, Manufacturer=Murata, Supplier Part Number 1=490-18654-1-ND, Category="Ceramic Capacitors", ComponentLink1Description=https://datasheet.octopart.com/GRM033R61C105ME15D-Murata-datasheet-155345049.pdf?src-supplier=Element14, ComponentLink1URL=https://datasheet.octopart.com/GRM033R61C105ME15D-Murata-datasheet-155345049.pdf?src-supplier=Element14, ComponentLink2Description=https://datasheet.octopart.com/GRM033R61C105ME15D-Murata-datasheet-165579666.pdf?src-supplier=TME, ComponentLink2URL=https://datasheet.octopart.com/GRM033R61C105ME15D-Murata-datasheet-165579666.pdf?src-supplier=TME, Item Type=Capacitor, Manufacturer Part Number=GRM033R61C105ME15D, Pricing 1="1=0.14, 10=0.098, 50=0.0554, 100=0.0459, 500=0.0322, 1000=0.02665, 2500=0.02481, 5000=0.0227 (USD)", RoHS=No, Stock 1=12823, Supplier 1=Digi-Key
C18: library part CC0402KRX5R7BB105, "CAP CER 1UF 16V X5R 0402", Case Code (Imperial)=0402, Case Code (Metric)=1005, Dielectric=X5R, LCSC Part Number=C325464, Manufacturer=Yageo, Max Operating Temperature=85°C, Min Operating Temperature=-55°C, Supplier Part Number 1=311-1691-6-ND, Tolerance=10%, Voltage Rating=16V, Capacitance=1uF, Case/Package=0402, ComponentLink1Description=http://www.yageo.com/documents/recent/UPY-GPHC_X5R_4V-to-50V_12.pdf?src-supplier=Avnet+Europe, ComponentLink1URL=http://www.yageo.com/documents/recent/UPY-GPHC_X5R_4V-to-50V_12.pdf?src-supplier=Avnet+Europe, Composition=Ceramic, Depth=0.5mm, Halogen Free="Halogen Free", Height=0.5mm, Item Type=Capacitor, Lead Free="Lead Free", Length=1mm, Manufacturer Part Number=CC0402KRX5R7BB105, Mount="Surface Mount", Packaging="Tape and Reel", Pricing 1="1=0.36, 10=0.252, 100=0.1512, 500=0.1134, 1000=0.09576, 2500=0.09072, 5000=0.08568 (USD)", Radiation Hardening=No, Stock 1=1405667, Supplier 1=Digi-Key, Termination=SMD/SMT, Thickness=0.022inch, Voltage Rating (DC)=16V, Weight=2.3E-05oz, Width=0.02inch
C25 C26: library part GRM0335C1H220JA01D, "CAP CER 22PF 50V C0G/NP0 0201", Case Code (Imperial)=0201, Case Code (Metric)=0603, Dielectric=C0G, LCSC Part Number=C76924, Manufacturer=Murata, Max Operating Temperature=125°C, Min Operating Temperature=-55°C, Package Quantity=1, Supplier Part Number=8202728, Temperature Coefficient=30ppm/°C, Tolerance=5%, Voltage=50V, Case/Package=0201, Category="Ceramic Capacitors", ComponentLink1Description=https://datasheet.ciiva.com/6271/partnumbering-e-01-6271146.pdf?src-supplier=Digi-Key, ComponentLink1URL=https://datasheet.ciiva.com/6271/partnumbering-e-01-6271146.pdf?src-supplier=Digi-Key, ComponentLink2Description=https://datasheet.ciiva.com/6271/partnumbering-e-01-6271143.pdf?src-supplier=Digi-Key, ComponentLink2URL=https://datasheet.ciiva.com/6271/partnumbering-e-01-6271143.pdf?src-supplier=Digi-Key, ComponentLink3Description=https://datasheet.ciiva.com/6271/partnumbering-e-01-6271149.pdf?src-supplier=Digi-Key, ComponentLink3URL=https://datasheet.ciiva.com/6271/partnumbering-e-01-6271149.pdf?src-supplier=Digi-Key, Depth=0.3mm, Height=0.3mm, Item Type=Capacitor, Lead Free="Lead Free", Length=0.024inch, Manufacturer Part Number=GRM0335C1H220JA01D, Material=4241ConductorMaterial, Mounting Technology="Surface Mount", Packaging="Tape and Reel", Pricing="500=0.004, 5000=0.003, 12500=0.002, 50000=0.002 (GBP)", RoHS=Yes, RoHS Compliant=Yes, Series=GRM, Stock=9500, Supplier=Rs, Termination=SMD/SMT, Voltage Rating=50V, Voltage Rating (DC)=50V, Width=0.012inch
C28: library part CC0201CRNPO9BN2R7, "CAP CER 2.7PF 50V C0G/NPO 0201", Case Code (Imperial)=0201, Case Code (Metric)=0603, Dielectric=C0G, LCSC Part Number=C325439, Manufacturer=Yageo, Max Operating Temperature=125°C, Min Operating Temperature=-55°C, Voltage Rating=50V, Case/Package=0201, Category="Ceramic Capacitors", ComponentLink1Description=https://datasheet.ciiva.com/13208/upy-gp-np0-16v-to-50v-8-13208314.pdf?src-supplier=Mouser, ComponentLink1URL=https://datasheet.ciiva.com/13208/upy-gp-np0-16v-to-50v-8-13208314.pdf?src-supplier=Mouser, Item Type=Capacitor, Length=0.024inch, Manufacturer Part Number=CC0201CRNPO9BN2R7, Mounting Technology="Surface Mount", Packaging="Tape and Reel", Pricing="15000=0.0017 (USD)", RoHS=Yes, RoHS Compliant=Yes, Series=CC, Stock=15000, Supplier=Avnet, Supplier Part Number=CC0201CRNPO9BN2R7, Termination=SMD/SMT, Thickness=0.013inch, Voltage Rating (DC)=50V, Weight=6E-06oz, Width=0.012inch
C29: library part CC0201BRNPO9BN4R7, "CAP CER 4.7PF 50V C0G/NPO 0201", Case/Package=0201, LCSC Part Number=C505471, Manufacturer=Yageo, Max Operating Temperature=125°C, Min Operating Temperature=-55°C, Voltage Rating=50V, Category="Ceramic Capacitors", ComponentLink1Description=https://www.yageo.com/upload/media/product/productsearch/datasheet/mlcc/UPY-GP_NP0_16V-to-50V_18.pdf?src-supplier=Digi-Key, ComponentLink1URL=https://www.yageo.com/upload/media/product/productsearch/datasheet/mlcc/UPY-GP_NP0_16V-to-50V_18.pdf?src-supplier=Digi-Key, ComponentLink2Description=http://www.yageo.com/documents/recent/UPY-GP_NP0_16V-to-50V_16.pdf?src-supplier=Digi-Key, ComponentLink2URL=http://www.yageo.com/documents/recent/UPY-GP_NP0_16V-to-50V_16.pdf?src-supplier=Digi-Key, Item Type=Capacitor, Length=0.024inch, Manufacturer Part Number=CC0201BRNPO9BN4R7, Mounting Technology="Surface Mount", Packaging="Tape and Reel", Pricing="15000=0.0023 (USD)", RoHS=Yes, RoHS Compliant=Yes, Series=CC, Stock=210000, Supplier="Arrow Electronics", Supplier Part Number=CC0201BRNPO9BN4R7, Thickness=0.013inch, Width=0.012inch
C31: library part TAJB336K010RNJ, "CAP TANT 33UF 10% 10V 1411", Case Code (Imperial)=1210, Case Code (Metric)=3528, Dielectric Material=Tantalum, ESR (Equivalent Series Resistance)=1.8R, LCSC Part Number=C7202, Leakage Current=3.3uA, Manufacturer="Kyocera AVX", Max Operating Temperature=125°C, Min Operating Temperature=-55°C, Package Quantity=1, Supplier Part Number 1=1364604P, Tolerance=10%, Voltage=10V, Case/Package=1210, Category="Tantalum Capacitors", ComponentLink1Description=https://datasheet.ciiva.com/26341/559435-da-01-en-tacc-b-3-2-mm-x-2-5-mm-x-1-9-mm-33-uf-26341776.pdf?src-supplier=Conrad, ComponentLink1URL=https://datasheet.ciiva.com/26341/559435-da-01-en-tacc-b-3-2-mm-x-2-5-mm-x-1-9-mm-33-uf-26341776.pdf?src-supplier=Conrad, ComponentLink2Description=https://datasheet.ciiva.com/7775/49917-7775706.pdf?src-supplier=Element14, ComponentLink2URL=https://datasheet.ciiva.com/7775/49917-7775706.pdf?src-supplier=Element14, ComponentLink3Description=https://datasheet.ciiva.com/7775/49917-7775705.pdf?src-supplier=Element14, ComponentLink3URL=https://datasheet.ciiva.com/7775/49917-7775705.pdf?src-supplier=Element14, ComponentLink4Description=https://datasheet.ciiva.com/7775/1680476-7775704.pdf?src-supplier=Element14, ComponentLink4URL=https://datasheet.ciiva.com/7775/1680476-7775704.pdf?src-supplier=Element14, ComponentLink5Description=https://datasheet.ciiva.com/264/taj-264134.pdf?src-supplier=Digi-Key, ComponentLink5URL=https://datasheet.ciiva.com/264/taj-264134.pdf?src-supplier=Digi-Key, ComponentLink6Description=https://datasheet.ciiva.com/264/taj-264133.pdf?src-supplier=Digi-Key, ComponentLink6URL=https://datasheet.ciiva.com/264/taj-264133.pdf?src-supplier=Digi-Key, ComponentLink7Description=https://datasheet.ciiva.com/264/taj-264135.pdf?src-supplier=Digi-Key, ComponentLink7URL=https://datasheet.ciiva.com/264/taj-264135.pdf?src-supplier=Digi-Key, ComponentLink8Description=https://datasheet.ciiva.com/12884/taj-27497-12884279.pdf?src-supplier=Mouser, ComponentLink8URL=https://datasheet.ciiva.com/12884/taj-27497-12884279.pdf?src-supplier=Mouser, ComponentLink9Description=https://datasheet.ciiva.com/14590/70001050-14590215.pdf?src-supplier=Allied+Electronics, ComponentLink9URL=https://datasheet.ciiva.com/14590/70001050-14590215.pdf?src-supplier=Allied+Electronics, ComponentLink10Description=https://datasheet.ciiva.com/14592/70001050-14592670.pdf?src-supplier=Allied+Electronics, ComponentLink10URL=https://datasheet.ciiva.com/14592/70001050-14592670.pdf?src-supplier=Allied+Electronics, ComponentLink11Description=https://datasheet.ciiva.com/11224/taj-11224937.pdf?src-supplier=Avnet, ComponentLink11URL=https://datasheet.ciiva.com/11224/taj-11224937.pdf?src-supplier=Avnet, ComponentLink12Description=https://datasheet.ciiva.com/16492/taj-16492863.pdf?src-supplier=Future+Electronics, ComponentLink12URL=https://datasheet.ciiva.com/16492/taj-16492863.pdf?src-supplier=Future+Electronics, ComponentLink13Description=https://datasheet.ciiva.com/11224/taj-11224941.pdf?src-supplier=Avnet, ComponentLink13URL=https://datasheet.ciiva.com/11224/taj-11224941.pdf?src-supplier=Avnet, Construction=Flat, Depth=2.8mm, Dissipation Factor=6%, Features="General Purpose", Height=1.9mm, Height - Seated (Max)=0.083inch, Item Type=Capacitor, Lead Free="Lead Free", Lead Pitch=1.4mm, Length=3.5mm, Manufacturer Part Number=TAJB336K010RNJ, Mounting Technology="Surface Mount,PCB", Packaging="Tape and Reel", Pins=2, Polarity=Polar, Pricing 1="100=0.01410, 400=0.24800, 1000=0.21600 (GBP)", Radiation Hardening=No, Reach SVHC Compliant=Yes, RoHS=Yes, RoHS Compliant=Yes, Series=TAJ, Stock 1=1580, Supplier 1=Rs, Termination=SMD/SMT, Voltage Rating=10V, Voltage Rating (DC)=10V, Width=2.8mm
D1: "35A 1.1V@400mA 1A 1kV MBS Bridge Rectifiers ROHS", JLCPCB Part Number=C2488, Manufacturer=MDD, Package=MBS, ComponentLink1Description=LCSC, ComponentLink1URL=https://www.lcsc.com/product-detail/Bridge-Rectifiers_MCC_MB6S-TP_MB6S-TP_C85619.html?gclid=CjwKCAjwjOunBhB4EiwA94JWsPhP5VxdRhkKtNAXxaeRo8Kbw1z5VNRY74bvbkYd4a4LtLXYHGrsEhoCPX4QAvD_BwE, Item Type="Bridge Rectifier", Manufacturer Part Number=MB10S
D2: "1.35V@1A 500ns 1A 800V Power-DI-123 Fast recovery/high efficiency diode ROHS", LCSC Part Number=C460678, Manufacturer="Diodes Incorporated", Package=Power-DI-123, ComponentLink1Description=LCSC, ComponentLink1URL=https://www.lcsc.com/product-detail/Fast-recovery-high-efficiency-diode_Diodes-Incorporated-DFLF1800-7_C460678.html, Item Type=Diode, Manufacturer Part Number=DFLF1800-7
D3: "DIODE GEN PURP 600V 3A SMB", LCSC Part Number=C84189, Manufacturer=STMicroelectronics, Supplier Part Number=511-STTH3R06U, Category="Rectifier Diodes", ComponentLink1Description=https://datasheet.ciiva.com/4452/cd00005137-58102-4452784.pdf?src-supplier=Mouser, ComponentLink1URL=https://datasheet.ciiva.com/4452/cd00005137-58102-4452784.pdf?src-supplier=Mouser, ComponentLink2Description=https://datasheet.ciiva.com/22735/1671131-22735253.pdf?src-supplier=Element14, ComponentLink2URL=https://datasheet.ciiva.com/22735/1671131-22735253.pdf?src-supplier=Element14, ComponentLink3Description=https://datasheet.ciiva.com/16491/cd00005137-16491959.pdf?src-supplier=Future+Electronics, ComponentLink3URL=https://datasheet.ciiva.com/16491/cd00005137-16491959.pdf?src-supplier=Future+Electronics, ComponentLink4Description=https://datasheet.ciiva.com/916/cd00005137-916206.pdf?src-supplier=Digikey, ComponentLink4URL=https://datasheet.ciiva.com/916/cd00005137-916206.pdf?src-supplier=Digikey, ComponentLink5Description=https://datasheet.ciiva.com/916/cd00005137-916207.pdf?src-supplier=Digikey, ComponentLink5URL=https://datasheet.ciiva.com/916/cd00005137-916207.pdf?src-supplier=Digikey, ComponentLink6Description=https://datasheet.ciiva.com/916/cd00005137-916208.pdf?src-supplier=Digikey, ComponentLink6URL=https://datasheet.ciiva.com/916/cd00005137-916208.pdf?src-supplier=Digikey, Item Type=Diode, Manufacturer Part Number=STTH3R06U, Pricing="1=0.87, 10=0.782, 50=0.782, 100=0.61, 1000=0.392, 10000=0.339 (USD)", RoHS=Yes, Stock=11406, Supplier=Mouser
D6: "DIODE GEN PURP 75V 200MA SOD523F", Average Rectified Current=200mA, Forward Current=300mA, LCSC Part Number=C232841, Manufacturer="ON Semiconductor / Fairchild", Max Forward Surge Current (Ifsm)=4A, Max Operating Temperature=150°C, Max Repetitive Reverse Voltage (Vrrm)=75V, Max Reverse Current=5uA, Min Operating Temperature=-55°C, Package Quantity=1, Power Dissipation=200mW, Supplier Part Number 1=6145918, Category="Rectifier Diodes", ComponentLink1Description=https://datasheet.ciiva.com/16744/1n4148wt-16744972.pdf?src-supplier=Future+Electronics, ComponentLink1URL=https://datasheet.ciiva.com/16744/1n4148wt-16744972.pdf?src-supplier=Future+Electronics, ComponentLink2Description=https://datasheet.ciiva.com/30479/0900766b810e1cd4-30479226.pdf?src-supplier=Rs, ComponentLink2URL=https://datasheet.ciiva.com/30479/0900766b810e1cd4-30479226.pdf?src-supplier=Rs, ComponentLink3Description=https://datasheet.ciiva.com/15208/getdatasheetpartid-146392-15208359.pdf?src-supplier=Verical, ComponentLink3URL=https://datasheet.ciiva.com/15208/getdatasheetpartid-146392-15208359.pdf?src-supplier=Verical, ComponentLink4Description=https://datasheet.ciiva.com/916/1n914bwt-916865.pdf?src-supplier=Digi-Key, ComponentLink4URL=https://datasheet.ciiva.com/916/1n914bwt-916865.pdf?src-supplier=Digi-Key, ComponentLink5Description=https://datasheet.ciiva.com/916/1n914bwt-916866.pdf?src-supplier=Digi-Key, ComponentLink5URL=https://datasheet.ciiva.com/916/1n914bwt-916866.pdf?src-supplier=Digi-Key, ComponentLink6Description=https://datasheet.ciiva.com/916/1n914bwt-916864.pdf?src-supplier=Digi-Key, ComponentLink6URL=https://datasheet.ciiva.com/916/1n914bwt-916864.pdf?src-supplier=Digi-Key, Contact Plating=Tin,Matte, Element Configuration=Single, Height=0.7mm, Item Type=Diode, Lead Free="Lead Free", Length=1.3mm, Manufacturer Part Number=1N4148WT, Max Reverse Voltage (DC)=75V, Mounting Technology="Surface Mount", Packaging="Tape and Reel", Pins=2, Pricing 1="1=0.0305, 20=0.0267, 125=0.0246, 750=0.0227, 4000=0.0204 (USD)", Radiation Hardening=No, Reach SVHC Compliant=No, Recovery Time=4ns, Reverse Recovery Time=4ns, Reverse Recovery Time-Max=4ns, RoHS=Yes, RoHS Compliant=Yes, Series=-, Stock 1=30, Supplier 1="Future Electronics", Weight=0.01g, Width=0.9mm
J1: "1x5P -40℃~+105℃ 15A 250V Green 14~26 Straight pin 5mm 1.5 1 5 Plugin,P=5mm Screw terminal ROHS", LCSC Part Number=C192780, Manufacturer="Ningbo Kangnex Elec", Package=Plugin,P=5mm, ComponentLink1Description=LCSC, ComponentLink1URL=https://www.lcsc.com/product-detail/Screw-terminal_Ningbo-Kangnex-Elec-WJ127-5-0-5P_C192780.html, Item Type="Screw terminal", Manufacturer Part Number=WJ127-5.0-5P
J2: library part C145963, "1x6P SH 1 1mm 6 SMD,P=1mm Wire To Board / Wire To Wire Connector ROHS", Manufacturer=BOOMELE, Package=SMD,P=1mm, ComponentLink1Description=LCSC, ComponentLink1URL=https://www.lcsc.com/product-detail/Wire-To-Board-Wire-To-Wire-Connector_BOOMELE-Boom-Precision-Elec-C145963_C145963.html, Item Type=Connector, LCSC Part Number=C145963, Manufacturer Part Number=C145963
K1: "AgSnO2 5V 10A 10A@250VAC Normal Open:1A(SPST-Normal Open) 4 Plugin,10.1x17.6mm Power Relays ROHS", LCSC Part Number=C91370, Manufacturer=HF, Package=Plugin,10.1x17.6mm, ComponentLink1Description=LCSC, ComponentLink1URL=https://www.lcsc.com/product-detail/Power-Relays_HF-Xiamen-Hongfa-Electroacoustic-HF32FA-G-005-HSL1_C91370.html, Item Type=Relay, Manufacturer Part Number=HF32FA-G/005-HSL1
L1: library part SPK0608-102MB, "200mA 1mH ±20% Plugin,D7xL11mm Color Ring Inductors/Through Hole Inductors ROHS", LCSC Part Number=C5127530, Manufacturer="LanTu Micro", Package=Plugin,D7xL11mm, ComponentLink1Description=LCSC, ComponentLink1URL=https://www.lcsc.com/product-detail/Color-Ring-Inductors-Through-Hole-Inductors_LanTu-Micro-SPK0608-102MB_C5127530.html, Item Type="Through Hole Inductor", Manufacturer Part Number=SPK0608-102MB
L2: library part SMDRI127-471MT, "470uH Shielded Power Inductors ±20% 1.5A SMD Power Inductors ROHS", LCSC Part Number=C10153, Manufacturer="SXN(Shun Xiang Nuo Elec)", Package=SMD, ComponentLink1Description=LCSC, ComponentLink1URL=https://www.lcsc.com/product-detail/Power-Inductors_SXN-Shun-Xiang-Nuo-Elec-SMDRI127-471MT_C10153.html, Item Type=Inductor, Manufacturer Part Number=SMDRI127-471MT
L3: library part MLG0603P2N0CT000, "FIXED IND 2NH 600MA 100 MOHM SMD", Case Code (Imperial)=0201, Case Code (Metric)=0603, Current Rating=600mA, DC Resistance (DCR)=100mR, LCSC Part Number=C531323, Manufacturer=TDK, Max Operating Temperature=125°C, Min Operating Temperature=-55°C, Package Quantity=15000, Self Resonant Frequency=8.5GHz, Supplier Part Number=445-172431-1-ND, Test Frequency=500MHz, Case/Package=0201, Category="Fixed Inductors", ComponentLink1Description=https://datasheet.ciiva.com/41860/inductor-commercial-high-frequency-mlg-qp-en-41860968.pdf?src-supplier=Digi-Key, ComponentLink1URL=https://datasheet.ciiva.com/41860/inductor-commercial-high-frequency-mlg-qp-en-41860968.pdf?src-supplier=Digi-Key, Core Material=Non-Magnetic, Height - Seated (Max)=0.013inch, Item Type=Inductor, Length=0.024inch, Manufacturer Part Number=MLG0603P2N0CT000, Mounting Technology="Surface Mount", Packaging="Cut Tape", Pricing="1=0.13, 10=0.118, 25=0.1, 50=0.0882, 100=0.0808, 250=0.07352, 500=0.06908, 1000=0.05292, 2500=0.04998 (USD)", RoHS=Yes, RoHS Compliant=Yes, Series=MLG-P, Shielding=Unshielded, Stock=23499, Supplier=Digi-Key, Width=0.012inch
L4: library part LQP03HQ1N6B02D, "FIXED IND 1.6NH 1A 50 MOHM SMD", Case Code (Imperial)=0201, Case Code (Metric)=0603, Current Rating=1A, DC Resistance (DCR)=50mR, LCSC Part Number=C237384, Manufacturer=Murata, Max Operating Temperature=125°C, Min Operating Temperature=-55°C, Self Resonant Frequency=10GHz, Supplier Part Number=490-13883-1-ND, Test Frequency=500MHz, Case/Package=0201, Category="Fixed Inductors", ComponentLink1Description=http://search.murata.co.jp/Ceramy/image/img/P02/JELF243C-0021.pdf?src-supplier=Digi-Key, ComponentLink1URL=http://search.murata.co.jp/Ceramy/image/img/P02/JELF243C-0021.pdf?src-supplier=Digi-Key, Core Material=Non-Magnetic, Item Type=Inductor, Manufacturer Part Number=LQP03HQ1N6B02D, Mounting Technology="Surface Mount", Packaging="Cut Tape", Pricing="1=0.16, 10=0.145, 25=0.1236, 50=0.109, 100=0.1, 250=0.09088, 500=0.08544, 1000=0.06545, 2500=0.06181 (USD)", RoHS=Yes, RoHS Compliant=Yes, Series=LQP03, Shielding=Unshielded, Stock=27606, Supplier=Digi-Key
L5: library part LQP03TN24NH02D, "140mA 24nH ±3% 2.3Ω 0201 Inductors (SMD) ROHS", Case Code (Imperial)=0201, Case Code (Metric)=0603, Current Rating=140mA, DC Resistance (DCR)=2.3R, LCSC Part Number=C206441, Manufacturer=Murata, Max Operating Temperature=125°C, Min Operating Temperature=-55°C, Package Quantity=15000, Self Resonant Frequency=2GHz, Supplier Part Number=490-13004-1-ND, Test Frequency=500MHz, Tolerance=3%, Case/Package=0201, Category="Fixed Inductors", ComponentLink1Description=https://datasheet.ciiva.com/29692/s0084e-29692461.pdf?src-supplier=Digi-Key, ComponentLink1URL=https://datasheet.ciiva.com/29692/s0084e-29692461.pdf?src-supplier=Digi-Key, Core Material=Non-Magnetic, DC Current=140mA, Depth=0.33mm, Height - Seated (Max)=0.013inch, Item Type=Inductor, Length=0.024inch, Manufacturer Part Number=LQP03TN24NH02D, Military Standard=Not, Mounting Technology="Surface Mount", Packaging="Tape and Reel", Pricing="1=0.1, 10=0.041, 25=0.0364, 50=0.031, 100=0.0273, 250=0.025, 500=0.02272, 1000=0.01909, 2500=0.01636 (USD)", RoHS=Yes, RoHS Compliant=Yes, Series=LQP03TN_02, Shielding=Unshielded, Stock=40849, Supplier=Digi-Key, Technology="THIN FILM", Width=0.012inch
LED1: "Colorless transparence Side stickers -40℃~+85℃ Common anode RGB 120° 60mW SMD,1.5x3.2mm Light Emitting Diodes (LED) ROHS", LCSC Part Number=C496820, Manufacturer=MEIHUA, Package=SMD,1.5x3.2mm, ComponentLink1Description=LCSC, ComponentLink1URL=https://www.lcsc.com/product-detail/Light-Emitting-Diodes-LED_MEIHUA-MHS110FRGBCT_C496820.html, Item Type="RGB LED", Manufacturer Part Number=MHS110FRGBCT
P1 P2 P3: "Test Point ON", Item Type="TEST POINT"
Q1: "40V 100mW 100@10mA,1V 200mA 300MHz 300mV@50mA,5mA NPN -55℃~+150℃@(Tj) SOT-723 Bipolar Transistors - BJT ROHS", LCSC Part Number=C2923360, Manufacturer="TECH PUBLIC", Package=SOT-723, ComponentLink1Description=LCSC, ComponentLink1URL=https://www.lcsc.com/product-detail/Bipolar-Transistors-BJT_TECH-PUBLIC-MMBT3904M_C2923360.html, Item Type=Mosfet, Manufacturer Part Number=MMBT3904M
R1: library part CRCW06033K00FKEAHP, "RES SMD 3K OHM 1% 1/3W 0603", LCSC Part Number=C844164, Manufacturer="Vishay Intertech", Package=0603, ComponentLink1Description=LCSC, ComponentLink1URL=https://www.lcsc.com/product-detail/Chip-Resistor-Surface-Mount_Vishay-Intertech-CRCW06033K00FKEAHP_C844164.html, Manufacturer Part Number=CRCW06033K00FKEAHP
R2: library part RC0603FR-073K83L, "RES 3.83K OHM 1% 1/10W 0603", Case Code (Imperial)=0603, Case Code (Metric)=1608, LCSC Part Number=C482840, Manufacturer=Yageo, Max Operating Temperature=155°C, Max Power Dissipation=100mW, Min Operating Temperature=-55°C, Supplier Part Number=1517903, Temperature Coefficient=100ppm/°C, Tolerance=1%, Voltage Rating=75V, Voltage Rating (DC)=50V, Case/Package=0603, Category="Chip SMD Resistors", ComponentLink1Description=https://datasheet.ciiva.com/11819/0900766b80f96399-11819347.pdf?src-supplier=Rs, ComponentLink1URL=https://datasheet.ciiva.com/11819/0900766b80f96399-11819347.pdf?src-supplier=Rs, ComponentLink2Description=https://datasheet.ciiva.com/15189/getdatasheetpartid-327814-15189723.pdf?src-supplier=Verical, ComponentLink2URL=https://datasheet.ciiva.com/15189/getdatasheetpartid-327814-15189723.pdf?src-supplier=Verical, Construction=Rectangular, Depth=0.8mm, Features="Moisture Resistant", Height=0.45mm, Item Type=Resistor, Lead Free="Lead Free", Length=1.6mm, Manufacturer Part Number=RC0603FR-073K83L, Military Standard=Not, Mounting Technology="Surface Mount", Number of Terminations=2, Packaging="Tape and Reel", Power Rating=100mW, Pricing="5000=0.0009, 75000=0.0009, 250000=0.0008, 750000=0.0008, 2500000=0.0007 (USD)", RoHS=Yes, RoHS Compliant=Yes, Series=RC, Stock=400000, Supplier="Future Electronics", Technology="THICK FILM", Termination=SMD/SMT, Weight=7.1E-05oz, Width=0.8mm, Working Voltage=75V
R3: library part RC0603FR-072K49L, "RES 2.49K OHM 1% 1/10W 0603", Case Code (Imperial)=0603, Case Code (Metric)=1608, LCSC Part Number=C108190, Manufacturer=Yageo, Max Operating Temperature=155°C, Max Power Dissipation=100mW, Min Operating Temperature=-55°C, Resistance Tolerance=1%, Resistor Type="Thick Film", Supplier Part Number=4546610, Temperature Coefficient=100ppm/°C, Voltage Rating=50V, Case/Package=0603, Category="Chip SMD Resistors", ComponentLink1Description=https://datasheet.ciiva.com/46395/443971-46395001.pdf?src-supplier=Element14, ComponentLink1URL=https://datasheet.ciiva.com/46395/443971-46395001.pdf?src-supplier=Element14, Features="Moisture Resistant", Height=450um, Item Type=Resistor, Lead Free=5697LeadFree, Length=1.6mm, Manufacturer Part Number=RC0603FR-072K49L, Number of Terminations=2, Packaging="Tape and Reel", Pins=2NUMBER, Power Rating=100mW, Pricing="5000=0.0013, 50000=0.0013, 150000=0.0012, 375000=0.0012, 1000000=0.0011 (USD)", Reach SVHC Compliant=Unknown, RoHS=Yes, RoHS Compliant=Yes, Series=RC, Stock=2930000, Supplier="Future Electronics", Termination=SMD/SMT, Tolerance=1%, Voltage Rating (DC)=50V, Width=800um
R4: library part RC0603FR-0715RL, "RES 15 OHM 1% 1/10W 0603", Current Rating=50mA, LCSC Part Number=C128059, Manufacturer=Yageo, Supplier Part Number=6308514, Voltage Rating (AC)=50V, Category="Chip SMD Resistors", ComponentLink1Description=https://datasheet.ciiva.com/5989/1686128-5989704.pdf?src-supplier=Farnell, ComponentLink1URL=https://datasheet.ciiva.com/5989/1686128-5989704.pdf?src-supplier=Farnell, ComponentLink2Description=https://datasheet.ciiva.com/8890/pyu-rc0603-51-rohs-l-4-8890742.pdf?src-supplier=Avnet, ComponentLink2URL=https://datasheet.ciiva.com/8890/pyu-rc0603-51-rohs-l-4-8890742.pdf?src-supplier=Avnet, ComponentLink3Description=https://datasheet.ciiva.com/12557/rc0603-272842-12557839.pdf?src-supplier=Mouser, ComponentLink3URL=https://datasheet.ciiva.com/12557/rc0603-272842-12557839.pdf?src-supplier=Mouser, ComponentLink4Description=https://datasheet.ciiva.com/2454/pyu-r-int-thick-7-2454840.pdf?src-supplier=Digikey, ComponentLink4URL=https://datasheet.ciiva.com/2454/pyu-r-int-thick-7-2454840.pdf?src-supplier=Digikey, ComponentLink5Description=https://datasheet.ciiva.com/2454/pyu-r-int-thick-7-2454841.pdf?src-supplier=Digikey, ComponentLink5URL=https://datasheet.ciiva.com/2454/pyu-r-int-thick-7-2454841.pdf?src-supplier=Digikey, ComponentLink6Description=https://datasheet.ciiva.com/2454/pyu-r-int-thick-7-2454842.pdf?src-supplier=Digikey, ComponentLink6URL=https://datasheet.ciiva.com/2454/pyu-r-int-thick-7-2454842.pdf?src-supplier=Digikey, ComponentLink7Description=https://datasheet.ciiva.com/7746/443971-7746262.pdf?src-supplier=Element14, ComponentLink7URL=https://datasheet.ciiva.com/7746/443971-7746262.pdf?src-supplier=Element14, ComponentLink8Description=https://datasheet.ciiva.com/7746/443971-7746263.pdf?src-supplier=Element14, ComponentLink8URL=https://datasheet.ciiva.com/7746/443971-7746263.pdf?src-supplier=Element14, Contact Material=157ConductorMaterial, Item Type=Resistor, Lead Free=5697LeadFree, Manufacturer Part Number=RC0603FR-0715RL, Pricing="5000=0.0011, 75000=0.001, 200000=0.001, 500000=0.001, 1250000=0.0009 (USD)", RoHS=Yes, Stock=5830000, Supplier="Future Electronics", Weight=250mg
R5: library part RC0805FR-7W10KL, "RES 10K OHM 1% 1/4W 0805", LCSC Part Number=C723404, Manufacturer=Yageo, Supplier Part Number=49AK3472, Category="Chip SMD Resistors", Item Type=Resistor, Manufacturer Part Number=RC0805FR-7W10KL, Pricing="1=0.153, 25=0.038, 50=0.03, 100=0.02 (USD)", RoHS=Yes, Stock=5000, Supplier=Avnet
R7 R15: library part RC0201FR-0710KL, "RES SMD 10K OHM 1% 1/20W 0201", LCSC Part Number=C106225, Manufacturer=Yageo, Package=0201, ComponentLink7Description=LCSC, ComponentLink7URL=https://www.lcsc.com/product-detail/Chip-Resistor-Surface-Mount_YAGEO-RC0201FR-0710KL_C106225.html, Item Type=Resistor, Manufacturer Part Number=RC0201FR-0710KL
R8: library part RC0201FR-07499RL, "RES 499 OHM 1% 1/20W 0201", Case Code (Imperial)=0201, Case Code (Metric)=0603, LCSC Part Number=C138137, Manufacturer=Yageo, Max Operating Temperature=125°C, Max Power Dissipation=50mW, Min Operating Temperature=-55°C, Resistor Type="Thick Film", Temperature Coefficient=200ppm/°C, Tolerance=1%, Case/Package=0201, Category="Chip SMD Resistors", ComponentLink1Description=http://www.yageo.com/documents/recent/PYu-RC_Group_51_RoHS_L_10.pdf?src-supplier=Digi-Key, ComponentLink1URL=http://www.yageo.com/documents/recent/PYu-RC_Group_51_RoHS_L_10.pdf?src-supplier=Digi-Key, ComponentLink2Description=http://www.yageo.com/documents/recent/PYu-RC_Group_51_RoHS_L_9.pdf?src-supplier=Digi-Key, ComponentLink2URL=http://www.yageo.com/documents/recent/PYu-RC_Group_51_RoHS_L_9.pdf?src-supplier=Digi-Key, Depth=0.3mm, Features="Moisture Resistant", Height=0.01inch, Item Type=Resistor, Lead Free="Lead Free", Length=0.024inch, Manufacturer Part Number=RC0201FR-07499RL, Military Standard=Not, Number of Terminations=2, Packaging="Tape and Reel", Pricing 1="10000=0.00128 (USD)", Resistance=499R, RoHS=Yes, RoHS Compliant=Yes, Stock 1=150000, Supplier 1=Avnet, Supplier Part Number 1=RC0201FR-07499RL, Width=0.012inch